# Altium PCB S56_MLD_tiny.pcbdoc (part 1 of 3)
Units mm, origin at the board's own origin, x right, y up, seen from the top; angles counter-clockwise.
Board outline 37.7 x 36.5 mm, 4 copper layers (Top Layer, Layer 1, Layer 3, Bottom Layer), stack 1.748 mm thick; 192 components, 89 nets, 791 pads, 423 vias.
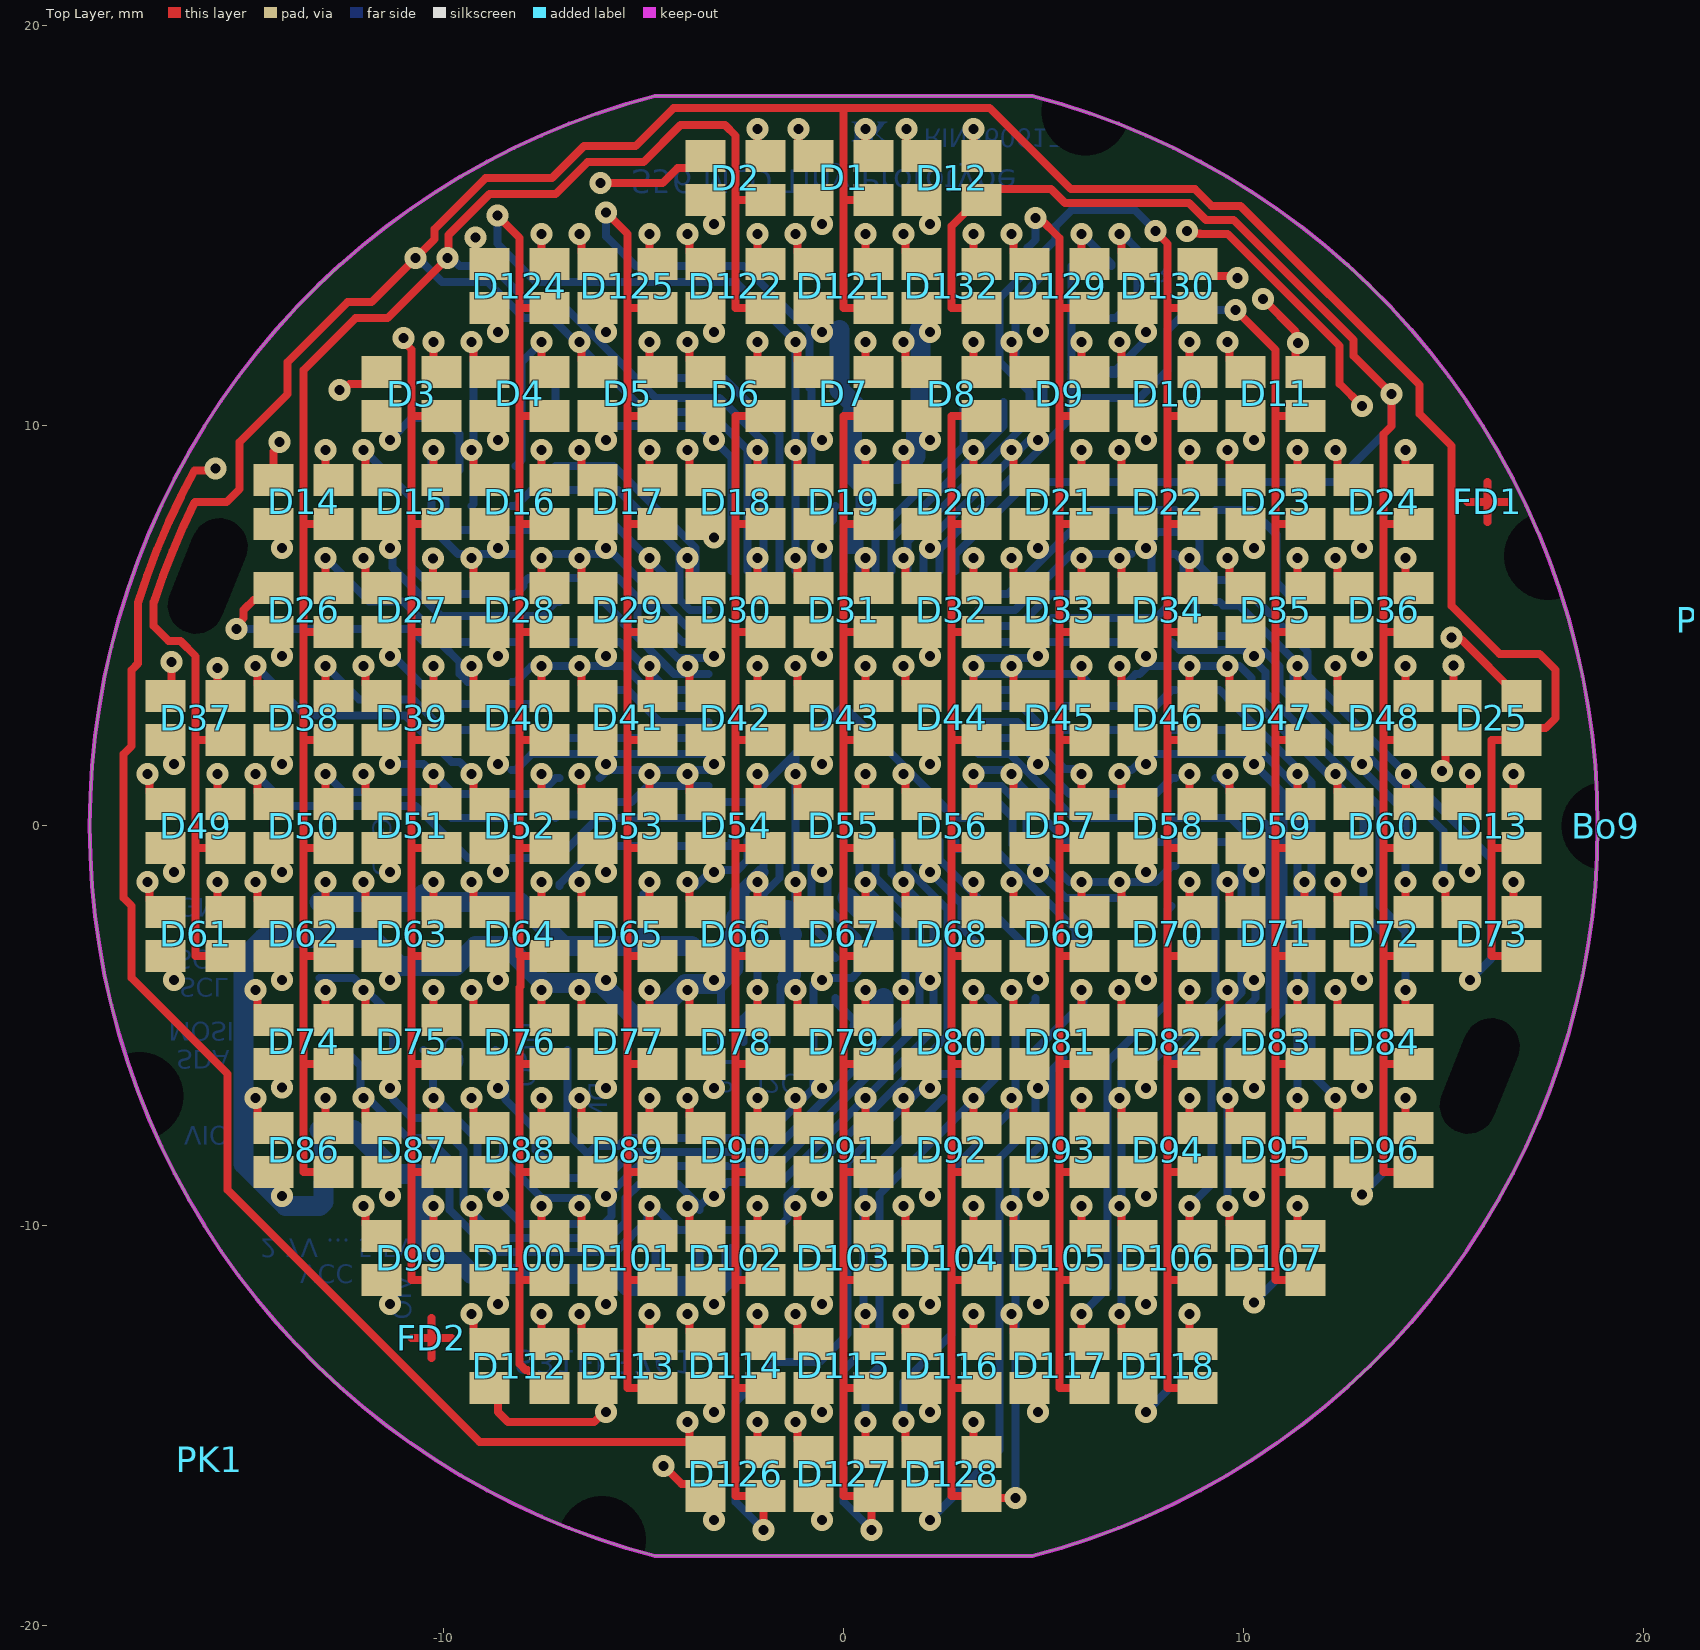
[diagram p0: Top Layer view]
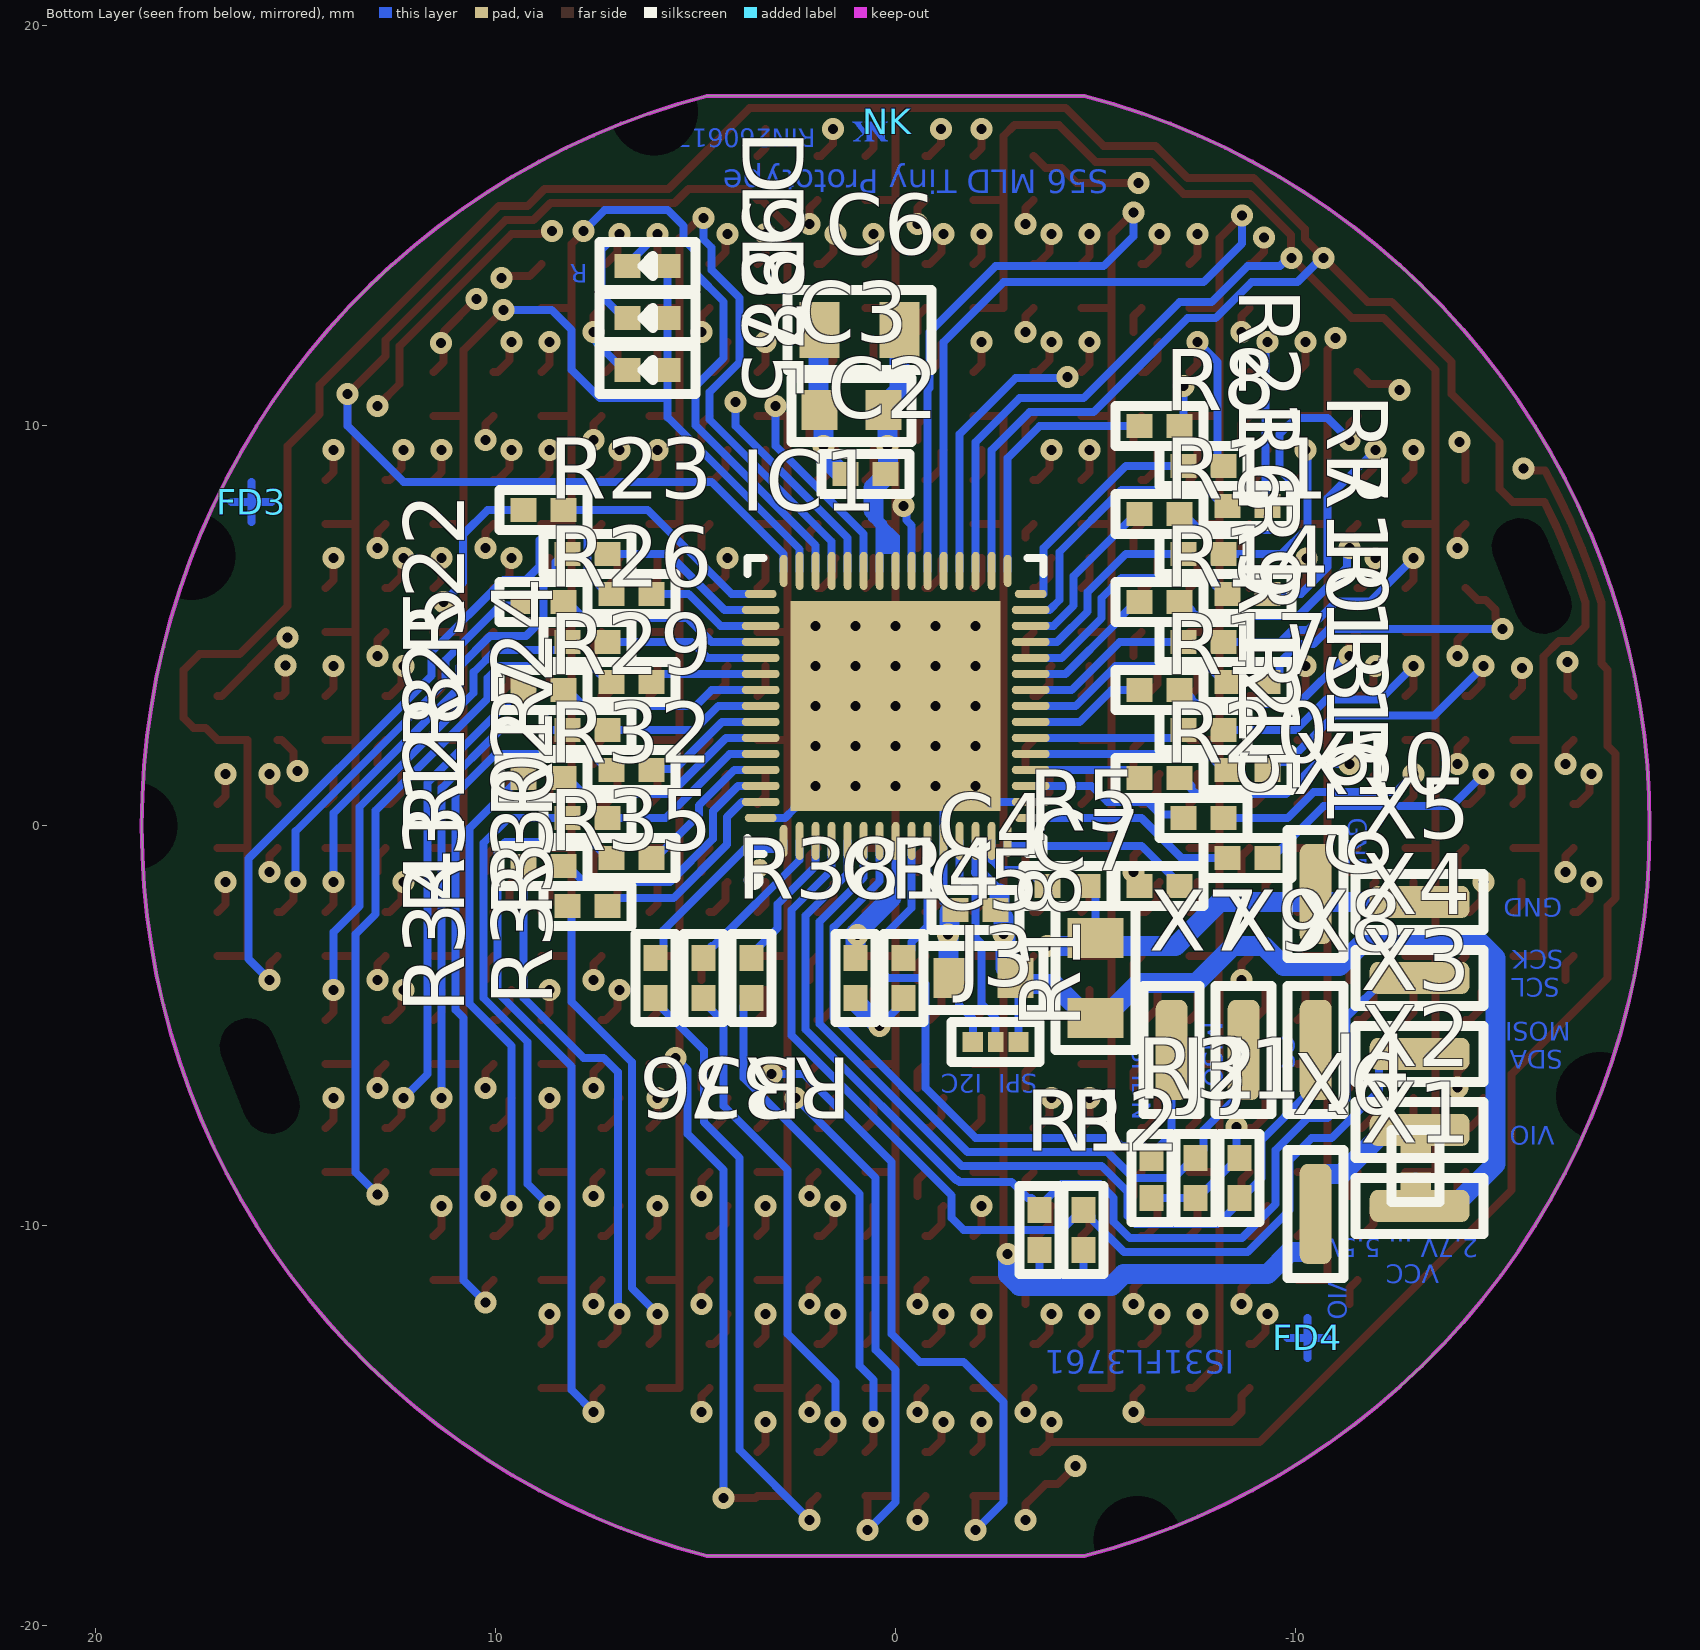
[diagram p1: Bottom Layer view, seen from below]
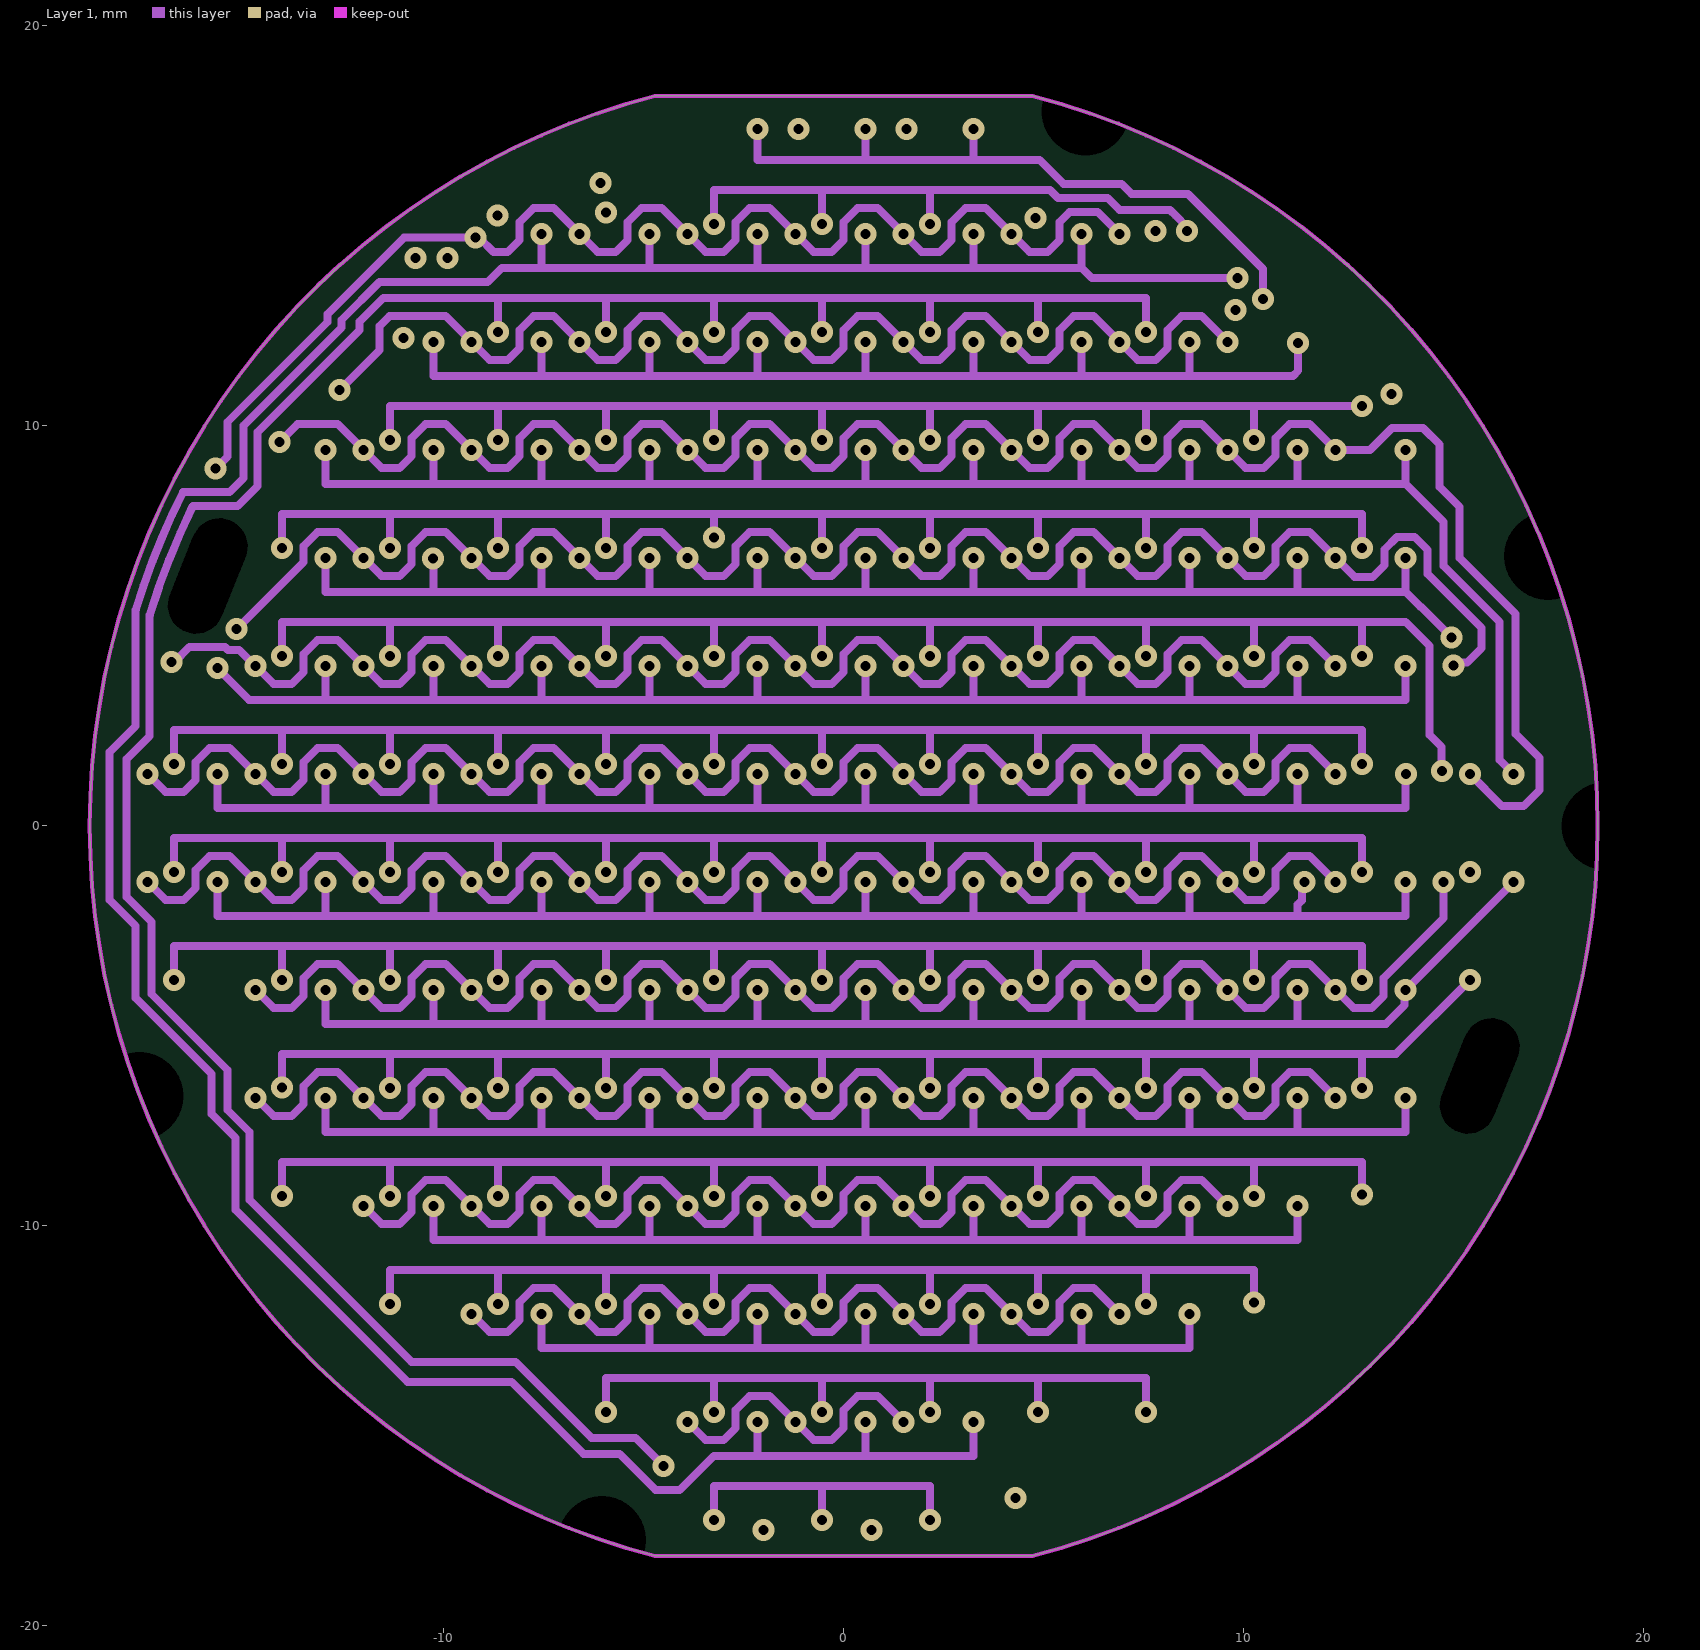
[diagram p2: Layer 1]
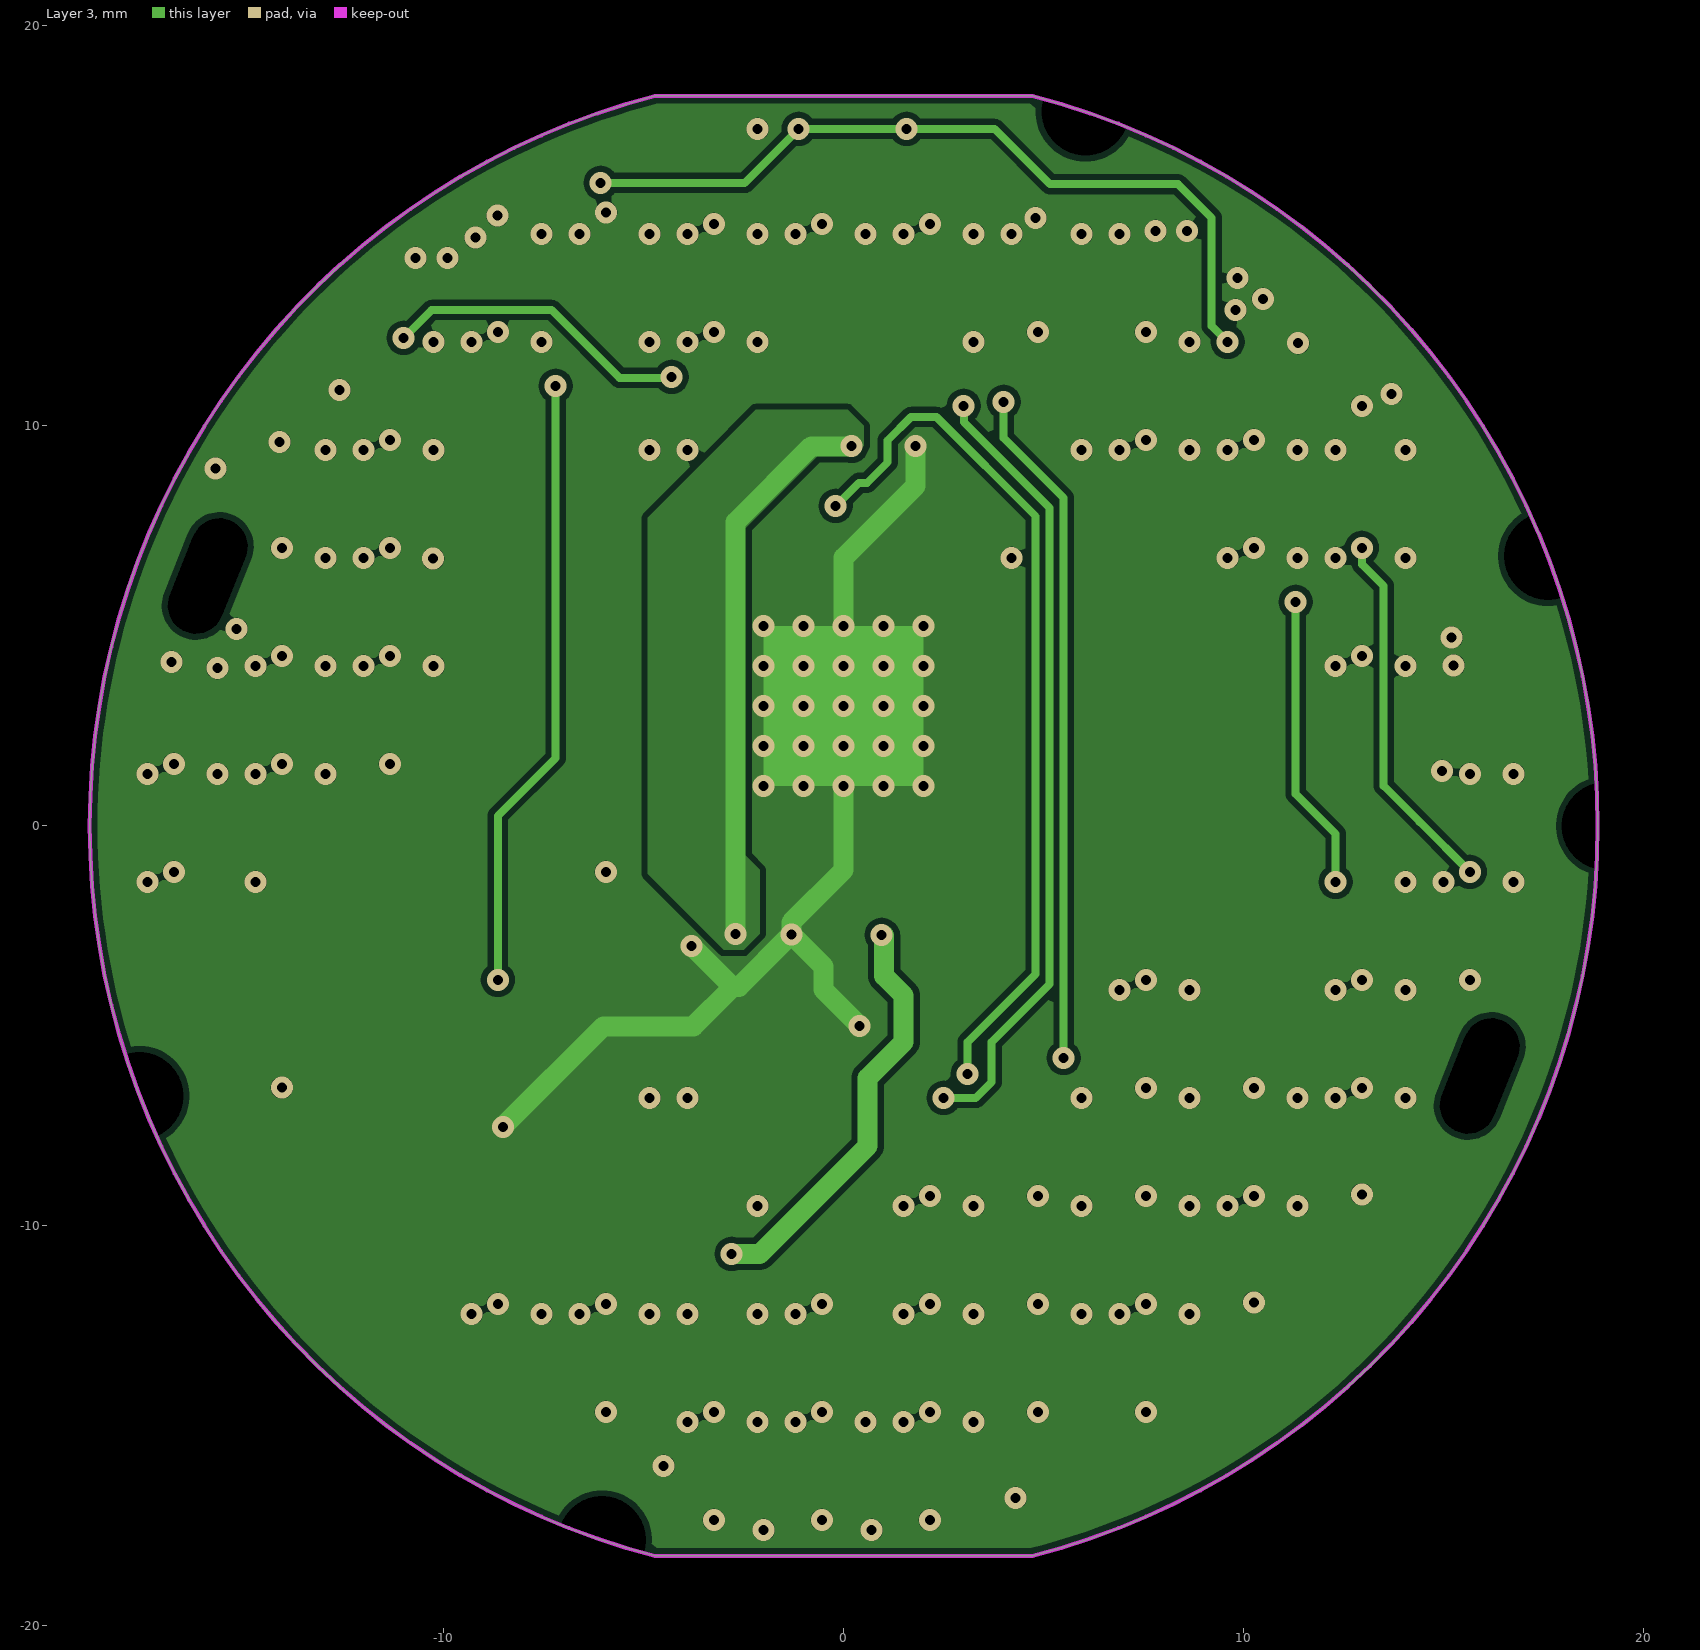
[diagram p3: Layer 3]

## Layer stack, top to bottom
Top Solder: solder mask 0.0102, Solder Resist, Dk 3.5
Top Layer: signal copper 0.035
Dielectric 1: prepreg 0.0711, PP-006, Dk 4.1
Layer 1: signal copper 0.018
Dielectric1: core 1.5, FR-4, Dk 4.8
Layer 3: signal copper 0.018
Dielectric 2: prepreg 0.0711, PP-006, Dk 4.1
Bottom Layer: signal copper 0.035
Bottom Solder: solder mask 0.0102, Solder Resist, Dk 3.5

## Board outline
-4.718,-18.25 4.718,-18.25 ccw(c0,0) 4.718,18.25 -4.718,18.25 ccw(c0,0)

## Design rules (kind name [scope] priority, off if disabled: settings)
Clearance [All] p1: gap=0.15 ignorepadtopadclearanceinfootprint=FALSE
ComponentClearance [All] p1: gap=0.25 collisioncheckmode=3 verticalgap=0.25 showdistances=FALSE
FabricationTestPointUsage TestPointUsage [All] p1: valid=0 allowmultiple=FALSE
FabricationTestpoint Testpoint [All] p1: side=3 testpointundercomponent=TRUE minsize=1.016 maxsize=2.54 preferedsize=1.524 minholesize=0 maxholesize=1.016 preferedholesize=0.813 testpointgrid=0.025 allowsidetop=TRUE allowsidebottom=TRUE usegrid=TRUE gridtolerance=0
HoleSize [All] p1: absolutevalues=TRUE maxlimit=10 minlimit=0.2 maxpercent=80.000 minpercent=20.000
HoleToHoleClearance [All] p1: gap=0.25 allowstackedmicrovias=TRUE
MinimumSolderMaskSliver [All] p1: minsoldermaskwidth=0.2
PlaneConnect [All] p1: planeconnectstyle=Direct reliefexpansion=0.508 reliefentries=4 reliefconductorwidth=0.254 reliefairgap=0.254
PolygonConnect [All] p1: connectstyle=Direct reliefconductorwidth=0.254 reliefentries=4 polygonreliefangle="90 Angle" airgapwidth=0.254
RoutingLayers [All] p1: top layer_v5=TRUE mid layer 1_v5=FALSE mid layer 2_v5=FALSE bottom layer_v5=TRUE
RoutingVias [All] p1: holewidth=0.6 width=1.2 viastyle="Through Hole" minholewidth=0.6 minwidth=1.2 maxholewidth=0.6 maxwidth=1.2
SilkToSilkClearance [All] p1: silktosilkclearance=0.25
SilkToSolderMaskClearance SilkscreenOverComponentPads [IsPad] p1: minsilkscreentomaskgap=0.25 clearancetoexposedcopper=TRUE
SolderMaskExpansion [All] p1: expansion=0.1 istentingtop=FALSE
SupplyNets "Schematic Supply Nets" [InNet('VIO')] p1: voltage=0.000
SupplyNets "Schematic Supply Nets_2" [InNet('AVCC')] p2: voltage=0.000
SupplyNets "Schematic Supply Nets_1" [InNet('GND')] p3: voltage=0.000
Width Fidujel [IsTrack And InComponent('FD*')] p1: maxlimit=0.2 minlimit=0.2 preferedwidth=0.2
Width [All] p2: maxlimit=1 minlimit=0.15 preferedwidth=0.5
20 further rules are at their usual default settings.

## Classes and differential pairs
component class S56_MLD_tiny_Main: NK X1 X2 X3 X4 X5 X6 X7 X8 X9 X10
net class N000-2_[1..33]: C1 C2 C3 C4 C5 C6 C7 C8 C9 C10 C11 C12 C13 C14 C15 C16 C17 C18 C19 C20 C21 C22 C23 C24 C25 C26 C27 C28 C29 C30 C31 C32 C33 N000-2_1 N000-2_2 N000-2_3 N000-2_4 N000-2_5 N000-2_6 N000-2_7 N000-2_8 N000-2_9 N000-2_10 N000-2_11 N000-2_12 N000-2_13 N000-2_14 N000-2_15 N000-2_16 N000-2_17 N000-2_18 N000-2_19 N000-2_20 N000-2_21 N000-2_22 N000-2_23 N000-2_24 N000-2_25 N000-2_26 N000-2_27 N000-2_28 N000-2_29 N000-2_30 N000-2_31 N000-2_32 N000-2_33
net class N000-1_[1..12]: N000-1_1 N000-1_2 N000-1_3 N000-1_4 N000-1_5 N000-1_6 N000-1_7 N000-1_8 N000-1_9 N000-1_10 N000-1_11 N000-1_12 R1 R2 R3 R4 R5 R6 R7 R8 R9 R10 R11 R12
component class Designator: C1 C2 C3 C4 C5 C6 C7 IC1 J1 J2 J3 J4 R1 R2 R3 R4 R5
component class Designator: D1 D2 D3 D4 D5 D6 D7 D8 D9 D10 D11 D12 D13 D14 D15 D16 D17 D18 D19 D20 D21 D22 D23 D24 D25 D26 D27 D28 D29 D30 D31 D32 D33 D34 D35 D36 D37 D38 D39 D40 D41 D42 D43 D44 D45 D46 D47 D48 D49 D50 D51 D52 D53 D54 D55 D56 D57 D58 D59 D60 D61 D62 D63 D64 D65 D66 D67 D68 D69 D70 D71 D72 D73 D74 D75 D76 D77 D78 D79 D80 D81 D82 D83 D84 D85 D86 D87 D88 D89 D90 D91 D92 D93 D94 D95 D96 D97 D98 D99 D100 D101 D102 D103 D104 D105 D106 D107 D108 D109 D110 D111 D112 D113 D114 D115 D116 D117 D118 D120 D121 D122 D123 D124 D125 D126 D127 D128 D129 D130 D132 R6 R7 R8 R9 R10 R11 R12 R13 R14 R15 R16 R17 R18 R19 R20 R21 R22 R23 R24 R25 R26 R27 R28 R29 R30 R31 R32 R33 R34 R35 R36 R37 R38

## Components (designator, comment, footprint, x,y, rotation, side; value= is the part's Value field where it differs from the comment)
Bo9 "Comment" NPTH_D2.2mm 19.05,0 r0 top locked
C1 "100nF" C0402G 1,-3.8 r270 bottom
C2 "100nF" C0402G 0.75,8.8 r180 bottom
C3 "470nF" C0603G 1.1,10.4 r180 bottom
C4 "100nF" C0402G -2,-2.1 r180 bottom
C5 "470nF" C0603G -2.2,-3.8 r180 bottom
C6 "10uF" C0805G 0.9,12.4 r180 bottom
C7 "10uF" C0805G -5,-3.8 r270 bottom
D1 "LED_RGB_BLOCK" PLCC-4_2020 0,16.2 r0 top
D2 "LED_RGB_BLOCK" PLCC-4_2020 -2.7,16.2 r0 top
D3 "LED_RGB_BLOCK" PLCC-4_2020 -10.8,10.8 r0 top
D4 "LED_RGB_BLOCK" PLCC-4_2020 -8.1,10.8 r0 top
D5 "LED_RGB_BLOCK" PLCC-4_2020 -5.4,10.8 r0 top
D6 "LED_RGB_BLOCK" PLCC-4_2020 -2.7,10.8 r0 top
D7 "LED_RGB_BLOCK" PLCC-4_2020 0,10.8 r0 top
D8 "LED_RGB_BLOCK" PLCC-4_2020 2.7,10.8 r0 top
D9 "LED_RGB_BLOCK" PLCC-4_2020 5.4,10.8 r0 top
D10 "LED_RGB_BLOCK" PLCC-4_2020 8.1,10.8 r0 top
D11 "LED_RGB_BLOCK" PLCC-4_2020 10.8,10.8 r0 top
D12 "LED_RGB_BLOCK" PLCC-4_2020 2.7,16.2 r0 top
D13 "LED_RGB_BLOCK" PLCC-4_2020 16.2,0 r0 top
D14 "LED_RGB_BLOCK" PLCC-4_2020 -13.5,8.1 r0 top
D15 "LED_RGB_BLOCK" PLCC-4_2020 -10.8,8.1 r0 top
D16 "LED_RGB_BLOCK" PLCC-4_2020 -8.1,8.1 r0 top
D17 "LED_RGB_BLOCK" PLCC-4_2020 -5.4,8.1 r0 top
D18 "LED_RGB_BLOCK" PLCC-4_2020 -2.7,8.1 r0 top
D19 "LED_RGB_BLOCK" PLCC-4_2020 0,8.1 r0 top
D20 "LED_RGB_BLOCK" PLCC-4_2020 2.7,8.1 r0 top
D21 "LED_RGB_BLOCK" PLCC-4_2020 5.4,8.1 r0 top
D22 "LED_RGB_BLOCK" PLCC-4_2020 8.1,8.1 r0 top
D23 "LED_RGB_BLOCK" PLCC-4_2020 10.8,8.1 r0 top
D24 "LED_RGB_BLOCK" PLCC-4_2020 13.5,8.1 r0 top
D25 "LED_RGB_BLOCK" PLCC-4_2020 16.2,2.7 r0 top
D26 "LED_RGB_BLOCK" PLCC-4_2020 -13.5,5.4 r0 top
D27 "LED_RGB_BLOCK" PLCC-4_2020 -10.8,5.4 r0 top
D28 "LED_RGB_BLOCK" PLCC-4_2020 -8.1,5.4 r0 top
D29 "LED_RGB_BLOCK" PLCC-4_2020 -5.4,5.4 r0 top
D30 "LED_RGB_BLOCK" PLCC-4_2020 -2.7,5.4 r0 top
D31 "LED_RGB_BLOCK" PLCC-4_2020 0,5.4 r0 top
D32 "LED_RGB_BLOCK" PLCC-4_2020 2.7,5.4 r0 top
D33 "LED_RGB_BLOCK" PLCC-4_2020 5.4,5.4 r0 top
D34 "LED_RGB_BLOCK" PLCC-4_2020 8.1,5.4 r0 top
D35 "LED_RGB_BLOCK" PLCC-4_2020 10.8,5.4 r0 top
D36 "LED_RGB_BLOCK" PLCC-4_2020 13.5,5.4 r0 top
D37 "LED_RGB_BLOCK" PLCC-4_2020 -16.2,2.7 r0 top
D38 "LED_RGB_BLOCK" PLCC-4_2020 -13.5,2.7 r0 top
D39 "LED_RGB_BLOCK" PLCC-4_2020 -10.8,2.7 r0 top
D40 "LED_RGB_BLOCK" PLCC-4_2020 -8.1,2.7 r0 top
D41 "LED_RGB_BLOCK" PLCC-4_2020 -5.4,2.7 r0 top
D42 "LED_RGB_BLOCK" PLCC-4_2020 -2.7,2.7 r0 top
D43 "LED_RGB_BLOCK" PLCC-4_2020 0,2.7 r0 top
D44 "LED_RGB_BLOCK" PLCC-4_2020 2.7,2.7 r0 top
D45 "LED_RGB_BLOCK" PLCC-4_2020 5.4,2.7 r0 top
D46 "LED_RGB_BLOCK" PLCC-4_2020 8.1,2.7 r0 top
D47 "LED_RGB_BLOCK" PLCC-4_2020 10.8,2.7 r0 top
D48 "LED_RGB_BLOCK" PLCC-4_2020 13.5,2.7 r0 top
D49 "LED_RGB_BLOCK" PLCC-4_2020 -16.2,0 r0 top
D50 "LED_RGB_BLOCK" PLCC-4_2020 -13.5,0 r0 top
D51 "LED_RGB_BLOCK" PLCC-4_2020 -10.8,0 r0 top
D52 "LED_RGB_BLOCK" PLCC-4_2020 -8.1,0 r0 top
D53 "LED_RGB_BLOCK" PLCC-4_2020 -5.4,0 r0 top
D54 "LED_RGB_BLOCK" PLCC-4_2020 -2.7,0 r0 top
D55 "LED_RGB_BLOCK" PLCC-4_2020 0,0 r0 top
D56 "LED_RGB_BLOCK" PLCC-4_2020 2.7,0 r0 top
D57 "LED_RGB_BLOCK" PLCC-4_2020 5.4,0 r0 top
D58 "LED_RGB_BLOCK" PLCC-4_2020 8.1,0 r0 top
D59 "LED_RGB_BLOCK" PLCC-4_2020 10.8,0 r0 top
D60 "LED_RGB_BLOCK" PLCC-4_2020 13.5,0 r0 top
D61 "LED_RGB_BLOCK" PLCC-4_2020 -16.2,-2.7 r0 top
D62 "LED_RGB_BLOCK" PLCC-4_2020 -13.5,-2.7 r0 top
D63 "LED_RGB_BLOCK" PLCC-4_2020 -10.8,-2.7 r0 top
D64 "LED_RGB_BLOCK" PLCC-4_2020 -8.1,-2.7 r0 top
D65 "LED_RGB_BLOCK" PLCC-4_2020 -5.4,-2.7 r0 top
D66 "LED_RGB_BLOCK" PLCC-4_2020 -2.7,-2.7 r0 top
D67 "LED_RGB_BLOCK" PLCC-4_2020 0,-2.7 r0 top
D68 "LED_RGB_BLOCK" PLCC-4_2020 2.7,-2.7 r0 top
D69 "LED_RGB_BLOCK" PLCC-4_2020 5.4,-2.7 r0 top
D70 "LED_RGB_BLOCK" PLCC-4_2020 8.1,-2.7 r0 top
D71 "LED_RGB_BLOCK" PLCC-4_2020 10.8,-2.7 r0 top
D72 "LED_RGB_BLOCK" PLCC-4_2020 13.5,-2.7 r0 top
D73 "LED_RGB_BLOCK" PLCC-4_2020 16.2,-2.7 r0 top
D74 "LED_RGB_BLOCK" PLCC-4_2020 -13.5,-5.4 r0 top
D75 "LED_RGB_BLOCK" PLCC-4_2020 -10.8,-5.4 r0 top
D76 "LED_RGB_BLOCK" PLCC-4_2020 -8.1,-5.4 r0 top
D77 "LED_RGB_BLOCK" PLCC-4_2020 -5.4,-5.4 r0 top
D78 "LED_RGB_BLOCK" PLCC-4_2020 -2.7,-5.4 r0 top
D79 "LED_RGB_BLOCK" PLCC-4_2020 0,-5.4 r0 top
D80 "LED_RGB_BLOCK" PLCC-4_2020 2.7,-5.4 r0 top
D81 "LED_RGB_BLOCK" PLCC-4_2020 5.4,-5.4 r0 top
D82 "LED_RGB_BLOCK" PLCC-4_2020 8.1,-5.4 r0 top
D83 "LED_RGB_BLOCK" PLCC-4_2020 10.8,-5.4 r0 top
D84 "LED_RGB_BLOCK" PLCC-4_2020 13.5,-5.4 r0 top
D85 "LED_ORANGE" D0402G 6.2,11.4 r0 bottom
D86 "LED_RGB_BLOCK" PLCC-4_2020 -13.5,-8.1 r0 top
D87 "LED_RGB_BLOCK" PLCC-4_2020 -10.8,-8.1 r0 top
D88 "LED_RGB_BLOCK" PLCC-4_2020 -8.1,-8.1 r0 top
D89 "LED_RGB_BLOCK" PLCC-4_2020 -5.4,-8.1 r0 top
D90 "LED_RGB_BLOCK" PLCC-4_2020 -2.7,-8.1 r0 top
D91 "LED_RGB_BLOCK" PLCC-4_2020 0,-8.1 r0 top
D92 "LED_RGB_BLOCK" PLCC-4_2020 2.7,-8.1 r0 top
D93 "LED_RGB_BLOCK" PLCC-4_2020 5.4,-8.1 r0 top
D94 "LED_RGB_BLOCK" PLCC-4_2020 8.1,-8.1 r0 top
D95 "LED_RGB_BLOCK" PLCC-4_2020 10.8,-8.1 r0 top
D96 "LED_RGB_BLOCK" PLCC-4_2020 13.5,-8.1 r0 top
D97 "LED_GREEN" D0402G 6.2,12.7 r0 bottom
D98 "LED_RED" D0402G 6.2,14 r0 bottom
D99 "LED_RGB_BLOCK" PLCC-4_2020 -10.8,-10.8 r0 top
D100 "LED_RGB_BLOCK" PLCC-4_2020 -8.1,-10.8 r0 top
D101 "LED_RGB_BLOCK" PLCC-4_2020 -5.4,-10.8 r0 top
D102 "LED_RGB_BLOCK" PLCC-4_2020 -2.7,-10.8 r0 top
D103 "LED_RGB_BLOCK" PLCC-4_2020 0,-10.8 r0 top
D104 "LED_RGB_BLOCK" PLCC-4_2020 2.7,-10.8 r0 top
D105 "LED_RGB_BLOCK" PLCC-4_2020 5.4,-10.8 r0 top
D106 "LED_RGB_BLOCK" PLCC-4_2020 8.1,-10.8 r0 top
D107 "LED_RGB_BLOCK" PLCC-4_2020 10.8,-10.8 r0 top
D112 "LED_RGB_BLOCK" PLCC-4_2020 -8.1,-13.5 r0 top
D113 "LED_RGB_BLOCK" PLCC-4_2020 -5.4,-13.5 r0 top
D114 "LED_RGB_BLOCK" PLCC-4_2020 -2.7,-13.5 r0 top
D115 "LED_RGB_BLOCK" PLCC-4_2020 0,-13.5 r0 top
D116 "LED_RGB_BLOCK" PLCC-4_2020 2.7,-13.5 r0 top
D117 "LED_RGB_BLOCK" PLCC-4_2020 5.4,-13.5 r0 top
D118 "LED_RGB_BLOCK" PLCC-4_2020 8.1,-13.5 r0 top
D121 "LED_RGB_BLOCK" PLCC-4_2020 0,13.5 r0 top
D122 "LED_RGB_BLOCK" PLCC-4_2020 -2.7,13.5 r0 top
D124 "LED_RGB_BLOCK" PLCC-4_2020 -8.1,13.5 r0 top
D125 "LED_RGB_BLOCK" PLCC-4_2020 -5.4,13.5 r0 top
D126 "LED_RGB_BLOCK" PLCC-4_2020 -2.7,-16.2 r0 top
D127 "LED_RGB_BLOCK" PLCC-4_2020 0,-16.2 r0 top
D128 "LED_RGB_BLOCK" PLCC-4_2020 2.7,-16.2 r0 top
D129 "LED_RGB_BLOCK" PLCC-4_2020 5.4,13.5 r0 top
D130 "LED_RGB_BLOCK" PLCC-4_2020 8.1,13.5 r0 top
D132 "LED_RGB_BLOCK" PLCC-4_2020 2.7,13.5 r0 top
FD1 "Comment" FIDTOP 16.1,8.1 r0 top
FD2 "Comment" FIDTOP -10.3,-12.8 r0 top
FD3 "Comment" FIDTOP 16.1,8.1 r180 bottom
FD4 "Comment" FIDTOP -10.3,-12.8 r180 bottom
IC1 "IS31FL3761-QFLS4-TR" QFN40P700X700X80_HS-61N 0,3 r90 bottom
J1 "ADDR1/CS" R0402G -8.6,-8.8 r270 bottom
J2 "ADDR2/MISO" R0402G -7.5,-8.8 r90 bottom
J3 "SEL" JUMP_2W_0402 -2.5,-5.4 r180 bottom
J4 "VIO := PVCC" JUMP_1W_0603_SOLDER -13,-8.5 r90 bottom
NK "" LOGO_NK_0MM5 0.2,17.6 r0 bottom
PK1 "Comment" PASSKREUZ -15.85,-15.85 r0 top locked
PK2 "Comment" PASSKREUZ 21.65,5.15 r0 top locked
R1 "4k7" R0402G -3.6,-10.1 r270 bottom
R2 "4k7" R0402G -4.7,-10.1 r270 bottom
R3 "100k" R0402G -6.4,-8.8 r90 bottom
R4 "10k" R0402G -0.2,-3.8 r90 bottom
R5 "27k" R0402G -4.3,-1.5 r0 bottom
R6 "9E1" R0402G -6.6,7.8 r0 bottom
R7 "9E1" R0402G -8.8,8 r0 bottom
R8 "47E" R0402G -7.7,9 r0 bottom
R9 "9E1" R0402G -6.6,5.6 r0 bottom
R10 "9E1" R0402G -8.8,5.8 r0 bottom
R11 "47E" R0402G -7.7,6.8 r0 bottom
R12 "9E1" R0402G -6.6,3.4 r0 bottom
R13 "9E1" R0402G -8.8,3.6 r0 bottom
R14 "47E" R0402G -7.7,4.6 r0 bottom
R15 "9E1" R0402G -6.6,1.2 r0 bottom
R16 "9E1" R0402G -8.8,1.4 r0 bottom
R17 "47E" R0402G -7.7,2.4 r0 bottom
R18 "9E1" R0402G -6.6,-1.5 r180 bottom
R19 "9E1" R0402G -8.8,-0.8 r0 bottom
R20 "47E" R0402G -7.7,0.2 r0 bottom
R21 "9E1" R0402G -6.6,10 r0 bottom
R22 "9E1" R0402G 8.8,7.9 r180 bottom
R23 "47E" R0402G 7.7,6.8 r180 bottom
R24 "9E1" R0402G 6.6,5.8 r180 bottom
R25 "9E1" R0402G 8.8,5.6 r180 bottom
R26 "47E" R0402G 7.7,4.6 r180 bottom
R27 "9E1" R0402G 6.6,3.6 r180 bottom
R28 "9E1" R0402G 8.8,3.4 r180 bottom
R29 "47E" R0402G 7.7,2.4 r180 bottom
R30 "9E1" R0402G 6.6,1.4 r180 bottom
R31 "9E1" R0402G 8.8,1.2 r180 bottom
R32 "47E" R0402G 7.7,0.2 r180 bottom
R33 "9E1" R0402G 6.6,-0.8 r180 bottom
R34 "9E1" R0402G 8.8,-1 r180 bottom
R35 "47E" R0402G 7.7,-2 r180 bottom
R36 "9E1" R0402G 6,-3.8 r90 bottom
R37 "9E1" R0402G 4.8,-3.8 r90 bottom
R38 "47E" R0402G 3.6,-3.8 r90 bottom
X1 "TEST_PIN" TEST_PAD_S -13.1,-9.5 r0 bottom
X2 "TEST_PIN" TEST_PAD_S -13.1,-7.6 r0 bottom
X3 "TEST_PIN" TEST_PAD_S -13.1,-5.7 r0 bottom
X4 "TEST_PIN" TEST_PAD_S -13.1,-3.8 r0 bottom
X5 "TEST_PIN" TEST_PAD_S -13.1,-1.9 r0 bottom
X6 "TEST_PIN" TEST_PAD_S -10.5,-9.7 r90 bottom
X7 "TEST_PIN" TEST_PAD_S -6.9,-5.6 r90 bottom
X8 "TEST_PIN" TEST_PAD_S -10.5,-5.6 r90 bottom
X9 "TEST_PIN" TEST_PAD_S -8.7,-5.6 r90 bottom
X10 "TEST_PIN" TEST_PAD_S -10.5,-1.7 r90 bottom

## Footprints (in the part's own frame and the unit in brackets; to place one, negate y for a bottom-side part, rotate by r counter-clockwise, add the part's x,y. Pads: shape width x height; smd on the part's side, far side on the other; paste and mask are expansions set on the pad)
C0402G [mm] "(true 0.1mm Grid)"
  rect 0.65x0.6 smd: 1(-0.5,0) 2(0.5,0)
  silkscreen extent -1.1,-0.5 1.1,0.5, body extent -0.5,-0.25 0.5,0.25, height 0.5
C0603G [mm] "(true 0.1mm Grid)"
  rect 0.9x1 smd: 1(-0.8,0) 2(0.8,0)
  silkscreen extent -1.5,-0.8 1.5,0.8, body extent -0.8,-0.4 0.8,0.4, height 0.8
C0805G [mm] "(true 0.1mm Grid)"
  rect 1x1.4 smd: 1(-1,0) 2(1,0)
  silkscreen extent -1.8,-1 1.8,1, body extent -1,-0.63 1,0.63, height 1
D0402G [mm] "(true 0.1mm Grid)"
  rect 0.65x0.6 smd: A(-0.5,0) K(0.5,0)
  silkscreen extent -1.2,-0.6 1.2,0.6
FIDTOP [mm]
  Top Layer lines w0.2: -0.5,0 0.5,0 ; 0,-0.5 0,0.5
JUMP_1W_0603_SOLDER [mil]
  rect 20x30 smd paste-39.37: 1(-16.25,0) 2(16.25,0)
  silkscreen extent -35,-24 35,24, body extent -16,-16 16,16, height 16
JUMP_2W_0402 [mil]
  rect 20x20 smd paste-39.37: 1(-22.5,0) 3(22.5,0)
  rect 15x20 smd paste-39.37: 2(0,0)
  silkscreen extent -43,-20 43,20
LOGO_NK_0MM5 [mm] "Times New Roman, bold, height 0.8mm"
  Top Layer region: 0,0.012 0.008,0.012 0.025,0.015 0.035,0.018 0.042,0.02 0.048,0.022 0.058,0.03 0.062,0.04 0.068,0.058 0.07,0.075 0.07,0.42 0.058,0.435 0.04,0.453 0.028,0.46 0.018,0.463 -0.002,0.465 -0.002,0.477 0.168,0.477 0.405,0.178 0.405,0.393 0.403,0.417 0.397,0.435 0.39,0.447 0.38,0.455 0.363,0.463 0.345,0.465 0.335,0.465 0.335,0.477 0.575,0.477 0.575,0.465 0.567,0.465 0.553,0.463 0.543,0.46 0.535,0.455 0.525,0.445 0.523,0.437 0.52,0.42 0.52,0.248 0.7,0.393 0.715,0.407 0.727,0.423 0.733,0.433 0.733,0.443 0.73,0.45 0.723,0.457 0.71,0.463 0.69,0.465 0.68,0.465 0.68,0.477 0.865,0.477 0.865,0.465 0.86,0.465 0.845,0.463 0.83,0.457 0.813,0.447 0.793,0.433 0.623,0.295 0.795,0.075 0.817,0.05 0.837,0.032 0.853,0.022 0.865,0.018 0.883,0.012 0.89,0.012 0.89,0 0.643,0 0.643,0.012 0.645,0.012 0.66,0.015 0.667,0.018 0.675,0.022 0.677,0.03 0.677,0.038 0.673,0.05 0.665,0.062 0.655,0.078 0.635,0.102 0.537,0.225 0.52,0.21 0.52,0.058 0.523,0.035 0.533,0.022 0.543,0.018 0.553,0.015 0.567,0.012 0.577,0.012 0.577,0 0.407,0 0.098,0.385 0.098,0.075 0.1,0.055 0.105,0.04 0.112,0.03 0.122,0.022 0.132,0.018 0.142,0.015 0.16,0.012 0.17,0.012 0.17,0 0,0
NPTH_D2.2mm [mm] "Bohrung 2,2mm nicht metalisiert"
  round 0 hole 2.2 unplated: 1(0,0)
PASSKREUZ [mm]
PLCC-4_2020 [mm]
  rect 1x0.8 smd: 1(0.75,-0.55) 2(-0.75,-0.55) 3(-0.75,0.55) 4(0.75,0.55)
  body extent -1,-1 1,1, height 0.9
QFN40P700X700X80_HS-61N [mm] "QFN, 60-Leads, Body 7.00x7.00mm, Pitch 0.40mm, Thermal Pad 5.25x5.25mm, IPC Medium Density"
  oval 0.8x0.2 smd: 1(-3.375,2.8) 15(-3.375,-2.8) 31(3.375,-2.8) 45(3.375,2.8)
  oval 0.95x0.2 smd: 2(-3.375,2.4) 3(-3.375,2) 4(-3.375,1.6) 5(-3.375,1.2) 6(-3.375,0.8) 7(-3.375,0.4) 8(-3.375,0) 9(-3.375,-0.4) 10(-3.375,-0.8) 11(-3.375,-1.2) 12(-3.375,-1.6) 13(-3.375,-2) 14(-3.375,-2.4) 32(3.375,-2.4) 33(3.375,-2) 34(3.375,-1.6) 35(3.375,-1.2) 36(3.375,-0.8) 37(3.375,-0.4) 38(3.375,0) 39(3.375,0.4) 40(3.375,0.8) 41(3.375,1.2) 42(3.375,1.6) 43(3.375,2) 44(3.375,2.4)
  oval 0.2x0.8 smd: 16(-2.8,-3.375) 30(2.8,-3.375) 46(2.8,3.375) 60(-2.8,3.375)
  oval 0.2x0.95 smd: 17(-2.4,-3.375) 18(-2,-3.375) 19(-1.6,-3.375) 20(-1.2,-3.375) 21(-0.8,-3.375) 22(-0.4,-3.375) 23(0,-3.375) 24(0.4,-3.375) 25(0.8,-3.375) 26(1.2,-3.375) 27(1.6,-3.375) 28(2,-3.375) 29(2.4,-3.375) 47(2.4,3.375) 48(2,3.375) 49(1.6,3.375) 50(1.2,3.375) 51(0.8,3.375) 52(0.4,3.375) 53(0,3.375) 54(-0.4,3.375) 55(-0.8,3.375) 56(-1.2,3.375) 57(-1.6,3.375) 58(-2,3.375) 59(-2.4,3.375)
  rect 5.25x5.25 smd paste-20: 61(0,0)
  round 0.45 smd paste-10 mask+0: ""(-4.05,3.4)
  silkscreen extent -4.47,-3.7 3.7,3.7, body extent -3.55,-3.55 3.55,3.55, height 0.8
R0402G [mm] "(true 0.1mm Grid)"
  rect 0.65x0.6 smd: 1(-0.5,0) 2(0.5,0)
  silkscreen extent -1.1,-0.5 1.1,0.5, body extent -0.5,-0.25 0.5,0.25, height 0.35
TEST_PAD_S [mm]
  rrect50% 2.5x0.8 smd paste-10: 1(0,0)
  silkscreen extent -1.6,-0.7 1.6,0.7

## Part data
C1 C2 C4: library part CAP10, "Capacitor, unipolar"
C3 C5: library part CAP20L, "Capacitor, unipolar", Manufacturer="KYOCERA AVX", Digikey=478-KAM15BR71E474KTCT-ND, Part=KAM15BR71E474KT
C6 C7: library part CAP20L, "Capacitor, unipolar", Manufacturer="Samsung Electro-Mechanics", Digikey=1276-1096-1-ND, Part=CL21A106KOQNNNE
D1 D2 D3 D4 D5 D6 D7 D8 D9 D10 D11 D12 D13 D14 D15 D16 D17 D18 D19 D20 D21 D22 D23 D24 D25 D26 D27 D28 D29 D30 D31 D32 D33 D34 D35 D36 D37 D38 D39 D40 D41 D42 D43 D44 D45 D46 D47 D48 D49 D50 D51 D52 D53 D54 D55 D56 D57 D58 D59 D60 D61 D62 D63 D64 D65 D66 D67 D68 D69 D70 D71 D72 D73 D74 D75 D76 D77 D78 D79 D80 D81 D82 D83 D84 D86 D87 D88 D89 D90 D91 D92 D93 D94 D95 D96 D99 D100 D101 D102 D103 D104 D105 D106 D107 D112 D113 D114 D115 D116 D117 D118 D121 D122 D124 D125 D126 D127 D128 D129 D130 D132: Manufacturer="Cree LED", Digikey=CLMVC-FKA-CL1D1L71BB7C3C3CT-ND, Part=CLMVC-FKA-CL1D1L71BB7C3C3
D85 D97 D98: "LED"
IC1: library part IS31FL3761, "IS31FL3761 in QFN-60", Manufacturer="Lumissil Microsystems", Digikey=2521-IS31FL3761-QFLS4-TRCT-ND, Part=IS31FL3761-QFLS4-TR
J1 J2 J4: library part JUMP_1WAY_SMD_HAT_SET
J3: library part JUMP_2WAY_SMD_HAT_SET1
NK: library part GENERIC_SYMBOL
R1 R2 R3 R4 R5: library part RES10_, "Resistor"
R6 R7 R8 R9 R10 R11 R12 R13 R14 R15 R16 R17 R18 R19 R20 R21 R22 R23 R24 R25 R26 R27 R28 R29 R30 R31 R32 R33 R34 R35 R36 R37 R38: library part RES10_, "Resistor", Manufacturer=YAGEO
  R6 R7 R9 R10 R12 R13 R15 R16 R18 R19 R21 R22 R24 R25 R27 R28 R30 R31 R33 R34 R36 R37: Digikey=13-RC0402FR-079R1LCT-ND, Part=RC0402FR-079R1L
  R8 R11 R14 R17 R20 R23 R26 R29 R32 R35 R38: Digikey=311-47.0LRCT-ND, Part=RC0402FR-0747RL

## Free pads (board coordinates)
  round 0.5 on Mech16: 7(-2.7,16.204) 7(0,16.204) 7(2.7,16.204) 8(-8.1,13.504) 8(-5.4,13.504) 8(-2.7,13.504) 8(0,13.504) 8(2.7,13.504) 8(5.4,13.504) 8(8.1,13.504) 9(-10.8,10.804) 9(-8.1,10.804) 9(-5.4,10.804) 9(-2.7,10.804) 9(0,10.804) 9(2.7,10.804) 9(5.4,10.804) 9(8.1,10.804) 9(10.8,10.804) 10(-13.5,8.104) 10(-10.8,8.104) 10(-8.1,8.104) 10(-5.4,8.104) 10(-2.7,8.104) 10(0,8.104) 10(2.7,8.104) 10(5.4,8.104) 10(8.1,8.104) 10(10.8,8.104) 10(13.5,8.104) 11(-13.5,5.404) 11(-10.8,5.404) 11(-8.1,5.404) 11(-5.4,5.404) 11(-2.7,5.404) 11(0,5.404) 11(2.7,5.404) 11(5.4,5.404) 11(8.1,5.404) 11(10.8,5.404) 11(13.5,5.404) 12(-16.2,2.704) 12(-13.5,2.704) 12(-10.8,2.704) 12(-8.1,2.704) 12(-5.4,2.704) 12(-2.7,2.704) 12(0,2.704) 12(2.7,2.704) 12(5.4,2.704) 12(8.1,2.704) 12(10.8,2.704) 12(13.5,2.704) 12(16.2,2.704) 13(-16.2,0.004) 13(-13.5,0.004) 13(-10.8,0.004) 13(-8.1,0.004) 13(-5.4,0.004) 13(-2.7,0.004) 13(0,0.004) 13(2.7,0.004) 13(5.4,0.004) 13(8.1,0.004) 13(10.8,0.004) 13(13.5,0.004) 13(16.2,0.004) 14(-16.2,-2.696) 14(-13.5,-2.696) 14(-10.8,-2.696) 14(-8.1,-2.696) 14(-5.4,-2.696) 14(-2.7,-2.696) 14(0,-2.696) 14(2.7,-2.696) 14(5.4,-2.696) 14(8.1,-2.696) 14(10.8,-2.696) 14(13.5,-2.696) 14(16.2,-2.696) 15(-13.5,-5.396) 15(-10.8,-5.396) 15(-8.1,-5.396) 15(-5.4,-5.396) 15(-2.7,-5.396) 15(0,-5.396) 15(2.7,-5.396) 15(5.4,-5.396) 15(8.1,-5.396) 15(10.8,-5.396) 15(13.5,-5.396) 16(-13.5,-8.096) 16(-10.8,-8.096) 16(-8.1,-8.096) 16(-5.4,-8.096) 16(-2.7,-8.096) 16(0,-8.096) 16(2.7,-8.096) 16(5.4,-8.096) 16(8.1,-8.096) 16(10.8,-8.096) 16(13.5,-8.096) 17(-10.8,-10.796) 17(-8.1,-10.796) 17(-5.4,-10.796) 17(-2.7,-10.796) 17(0,-10.796) 17(2.7,-10.796) 17(5.4,-10.796) 17(8.1,-10.796) 17(10.8,-10.796) 18(-8.1,-13.496) 18(-5.4,-13.496) 18(-2.7,-13.496) 18(0,-13.496) 18(2.7,-13.496) 18(5.4,-13.496) 18(8.1,-13.496) 19(-2.7,-16.196) 19(0,-16.196) 19(2.7,-16.196)
  round 0 hole 2.2 unplated: 21(-17.601,-6.747) 21(17.601,6.747) 23(-6.04,-17.856) 23(6.04,17.856)
  round 0 hole 1.4 slot 3 at 68.39 deg unplated: 22(-15.9,6.25)
  round 0 hole 1.4 slot 3 at 68.38 deg unplated: 22(15.9,-6.25)
  round 2.2 on Mech16: ""(-10.605,10.605) ""(10.605,-10.605)

## Via types
v1: diameter 0.55, hole 0.25, Top Layer to Layer 1, tented both sides, 200 vias
v2: diameter 0.55, hole 0.25, Top Layer to Bottom Layer, tented both sides, 178 vias
v3: diameter 0.55, hole 0.25, Layer 3 to Bottom Layer, tented both sides, 44 vias
v4: diameter 0.55/0.55/0.55/0.55 (per signal layer), hole 0.25, Top Layer to Bottom Layer, tented both sides, 1 vias

## Nets (pads, with @x,y where several pads share a name; then routed paths per layer and width w, separated by ;. In a path a pad name is that pad's centre, name@x,y a point inside that pad or via, vN(x,y) a via of type N, cw(c..) or ccw(c..) an arc to the next point about the centre after c; other vN are vias at no path point)
ADDR1: IC1.6 J1.2 X8.1 | length 22.8
  Bottom Layer w0.2: X8.1@-10.5,-5.6 -10.271,-5.829 -10.271,-6.729 -9.15,-7.85 -9.15,-8.8 -8.65,-9.3 J1.2@-8.6,-9.3 -8.6,-9.4 -8.05,-9.95 -5.996,-9.95 -5.8,-9.754 -5.8,-9.151 -5.149,-8.5 -1.651,-8.5 1.9,-4.949 1.9,-2.387 0.8,-1.287 IC1.6@0.8,-0.375
ADDR2: IC1.7 J2.2 X9.1 | length 19
  Bottom Layer w0.2: X9.1@-8.7,-5.6 -8.462,-5.838 -8.462,-6.838 -7.7,-7.6 -7.7,-8.1 J2.2@-7.5,-8.3 ; J2.2@-7.45,-8.3 -6.95,-8.8 -5.943,-8.8 -5.293,-8.15 -1.796,-8.15 1.55,-4.804 1.55,-2.532 0.4,-1.382 IC1.7@0.4,-0.375
AVCC: C2.2 C3.2 C4.2 C5.2 C6.2 C7.2 IC1.13 IC1.38 IC1.39 J3.3 J4.1 X1.1 | length 48.6
  Layer 3 w0.5: v3(-2.7,-2.7) -2.7,7.6 -0.81,9.49 0.19,9.49 v3(0.2,9.5)
  Bottom Layer w0.2: J3.3@-3.072,-5.4 C5.2@-3.072,-4.05 ; -2.1,-1.2 -2,-1.1 IC1.13@-2,-0.375 ; IC1.38@0,6.375 0,6.87 0.355,7.225 0.4,7.225 IC1.39@0.4,6.375
  Bottom Layer w0.3: 0.355,7.225 0.355,7.535 0.55,7.73 0.55,7.9
  Bottom Layer w0.35: -2.6,-1.694 -2.054,-1.148 -2.052,-1.148
  Bottom Layer w0.5: J4.1@-13,-8.913 -13,-9.4 X1.1@-13.1,-9.5 -13.95,-9.5 -15,-8.45 -15,-3.3 -14.5,-2.8 -11.8,-2.8 -11.1,-3.5 -9.7,-3.5 -9.2,-3 -8.434,-3 -7.509,-3.925 -6.075,-3.925 -5.2,-4.8 C7.2@-5,-4.8 -4.8,-4.8 -3.95,-3.95 -3.15,-3.95 C5.2@-3,-3.8 ; C5.2@-2.852,-3.652 -2.75,-3.55 -2.75,-2.764 -2.7,-2.714 v3(-2.7,-2.7) -2.69,-2.69 -2.69,-2.29 C4.2@-2.5,-2.1 -2.55,-2.1 -2.6,-2.05 -2.6,-1.694 ; C6.2@-0.1,12.4 -0.1,10.9 0.3,10.5 C3.2@0.3,10.4 0.21,10.31 0.21,9.51 v3(0.2,9.5) 0.19,9.49 0.19,8.85 0.24,8.8 C2.2@0.25,8.8 0.25,8.75 0.55,8.45 0.55,7.9
C1: IC1.15 R18.2 | length 4.9
  Bottom Layer w0.2: R18.2@-7.1,-1.5 -7.1,-1.45 -6.15,-0.5 -2.8,-0.5 IC1.15@-2.8,-0.375
C2: IC1.16 R19.2 | length 5.3
  Bottom Layer w0.2: R19.2@-8.3,-0.8 -8.2,-0.8 -7.146,-0.8 -6.146,0.2 IC1.16@-3.375,0.2
C3: IC1.18 R20.2 | length 4.2
  Bottom Layer w0.2: R20.2@-7.2,0.2 -7.117,0.283 -6.617,0.283 -6.3,0.6 -5.3,0.6 -4.9,1 IC1.18@-3.375,1
C4: IC1.19 R15.2 | length 2.8
  Bottom Layer w0.2: R15.2@-6.1,1.2 -5.9,1.4 -4.775,1.4 IC1.19@-3.375,1.4
C5: IC1.20 R16.2 | length 5.1
  Bottom Layer w0.2: R16.2@-8.3,1.4 -8.2,1.4 -7.8,1.8 IC1.20@-3.375,1.8
C6: IC1.21 R17.2 | length 3.9
  Bottom Layer w0.2: R17.2@-7.2,2.4 -7,2.2 IC1.21@-3.375,2.2
C7: IC1.22 R12.2 | length 3.1
  Bottom Layer w0.2: R12.2@-6.1,3.4 -5.4,3.4 -4.6,2.6 IC1.22@-3.375,2.6
C8: IC1.23 R13.2 | length 5.5
  Bottom Layer w0.2: R13.2@-8.3,3.6 -8.2,3.6 -7.8,4 -5.5,4 -4.5,3 IC1.23@-3.375,3
C9: IC1.24 R14.2 | length 4.3
  Bottom Layer w0.2: R14.2@-7.2,4.6 -5.6,4.6 -4.4,3.4 IC1.24@-3.375,3.4
C10: IC1.25 R9.2 | length 3.5
  Bottom Layer w0.2: R9.2@-6.1,5.6 -6,5.6 -5.5,5.1 -5.5,5.055 -4.245,3.8 IC1.25@-3.375,3.8
C11: IC1.26 R10.2 | length 6.3
  Bottom Layer w0.2: R10.2@-8.3,5.8 -8.2,5.8 -8,6 -8,6.083 -7.883,6.2 -5.646,6.2 -5.15,5.704 -5.15,5.2 -4.15,4.2 IC1.26@-3.375,4.2
C12: IC1.27 R11.2 | length 5
  Bottom Layer w0.2: R11.2@-7.2,6.8 -5.751,6.8 -4.8,5.849 -4.8,5.365 -4.035,4.6 IC1.27@-3.375,4.6
C13: IC1.28 R6.2 | length 4.3
  Bottom Layer w0.2: R6.2@-6.1,7.8 -6,7.8 -4.45,6.25 -4.45,5.51 -3.94,5 IC1.28@-3.375,5
C14: IC1.29 R7.2 | length 7
  Bottom Layer w0.2: R7.2@-8.3,8 -8.2,8 -7.8,8.4 -5.646,8.4 -4.1,6.854 -4.1,5.655 -3.845,5.4 IC1.29@-3.375,5.4
C15: IC1.30 R8.2 | length 5.8
  Bottom Layer w0.2: R8.2@-7.2,9 -5.751,9 -3.7,6.949 -3.7,5.8 IC1.30@-3.375,5.8
C16: IC1.31 R21.2 | length 6.5
  Bottom Layer w0.2: R21.2@-6.1,10 -6,10 -3.6,10 -2.8,9.2 IC1.31@-2.8,6.375
C17: IC1.46 R22.2 | length 5.8
  Bottom Layer w0.2: IC1.46@3.375,5.8 4.1,5.8 6.2,7.9 R22.2@8.3,7.9
C18: IC1.47 R23.2 | length 4.4
  Bottom Layer w0.2: IC1.47@3.375,5.4 4.28,5.4 5.68,6.8 R23.2@7.2,6.8
C19: IC1.48 R24.2 | length 3.1
  Bottom Layer w0.2: IC1.48@3.375,5 4.375,5 5.175,5.8 R24.2@6.1,5.8
C20: IC1.49 R25.2 | length 5.3
  Bottom Layer w0.2: IC1.49@3.375,4.6 4.605,4.6 5.205,5.2 7.8,5.2 8.2,5.6 R25.2@8.3,5.6
C21: IC1.50 R26.2 | length 4
  Bottom Layer w0.2: IC1.50@3.375,4.2 4.7,4.2 5.1,4.6 R26.2@7.2,4.6
C22: IC1.51 R27.2 | length 2.8
  Bottom Layer w0.2: IC1.51@3.375,3.8 5.9,3.8 R27.2@6.1,3.6
C23: IC1.52 R28.2 | length 5.3
  Bottom Layer w0.2: IC1.52@3.375,3.4 4.6,3.4 5,3 7.8,3 8.2,3.4 R28.2@8.3,3.4
C24: IC1.53 R29.2 | length 4.1
  Bottom Layer w0.2: IC1.53@3.375,3 4.436,3 5.036,2.4 R29.2@7.2,2.4
C25: IC1.54 R30.2 | length 3.2
  Bottom Layer w0.2: IC1.54@3.375,2.6 4.341,2.6 5.517,1.424 5.976,1.424 6,1.4 R30.2@6.1,1.4
C26: IC1.55 R31.2 | length 5.7
  Bottom Layer w0.2: IC1.55@3.375,2.2 4.246,2.2 5.646,0.8 7.8,0.8 8.2,1.2 R31.2@8.3,1.2
C27: IC1.56 R32.2 | length 4.5
  Bottom Layer w0.2: IC1.56@3.375,1.8 4.151,1.8 5.751,0.2 R32.2@7.2,0.2
C28: IC1.57 R33.2 | length 3.8
  Bottom Layer w0.2: IC1.57@3.375,1.4 4.035,1.4 4.917,0.517 4.917,0.283 6,-0.8 R33.2@6.1,-0.8
C29: IC1.58 R34.2 | length 6.5
  Bottom Layer w0.2: IC1.58@3.375,1 3.94,1 4.567,0.372 4.567,-0.321 5.646,-1.4 7.8,-1.4 8.2,-1 R34.2@8.3,-1
C30: IC1.59 R35.2 | length 5.3
  Bottom Layer w0.2: IC1.59@3.375,0.6 3.845,0.6 4.217,0.228 4.217,-0.466 5.551,-1.8 7,-1.8 R35.2@7.2,-2
C31: IC1.1 R36.2 | length 4.8
  Bottom Layer w0.2: IC1.1@2.8,-0.375 2.8,-0.575 3.775,-0.575 5.8,-2.6 5.8,-3 6,-3.2 R36.2@6,-3.3
C32: IC1.2 R37.2 | length 3.9
  Bottom Layer w0.2: IC1.2@2.4,-0.375 2.4,-0.845 4.555,-3 4.6,-3 4.8,-3.2 R37.2@4.8,-3.3
C33: IC1.3 R38.2 | length 3.6
  Bottom Layer w0.2: IC1.3@2,-0.375 2,-1.002 2.95,-1.952 2.95,-2.55 3.6,-3.2 R38.2@3.6,-3.3
GND: C1.2 C2.1 C3.1 C4.1 C5.1 C6.1 C7.1 IC1.11 IC1.17 IC1.60 IC1.61 J1.1 J2.1 J3.1 R3.1 R4.1 R5.1 X5.1 X10.1 | length 64.5
  Layer 3 w0.5: v3(-8.521,-7.521) -6.007,-5.007 -3.759,-5.007 -2.776,-4.024 ; v3(-3.8,-3) -2.776,-4.024 ; v3(0.4,-5) -0.511,-4.089 -0.511,-3.508 v3(-1.31,-2.71) ; v3(1.8,9.5) 1.79,9.49 1.79,8.496 0,6.706 v3(0,5) v3(0,4) v3(0,3) v3(0,2) v3(0,1) 0,-1.1 -1.31,-2.41 v3(-1.31,-2.71) ; -2.776,-4.024 -2.624,-4.024 v3(-1.31,-2.71)
  Bottom Layer w0.2: J1.1@-8.6,-8.3 -8.5,-8.2 -8.521,-8.179 v3(-8.521,-7.521) ; J1.1@-8.5,-8.3 -8.5,-8.35 -8.4,-8.45 -7.55,-9.3 J2.1@-7.5,-9.3 R3.1@-6.4,-9.3 ; C7.1@-5,-3 C7.1@-5,-2.8 -5,-1.7 R5.1@-4.8,-1.5 ; IC1.17@-3.375,0.6 -2.425,0.6 IC1.61@-1.212,1.812 ; J3.1@-1.929,-5.4 -1.929,-4.829 -1.583,-4.483 -1.583,-3.983 C5.1@-1.4,-3.8 ; C4.1@-1.5,-2.1 -1.4,-2.1 -1.2,-1.9 IC1.11@-1.2,-0.375 -1.2,1.8 v3(-1,2) v3(0,3) v3(1,2) 2.525,0.475 2.525,0.442 2.767,0.2 IC1.60@3.375,0.2 ; R4.1@-0.2,-4.3 -0.2,-4.4 v3(0.4,-5)
  Bottom Layer w0.5: X5.1@-13.1,-1.9 X10.1@-10.5,-1.9 ; X10.1@-10.5,-1.7 X10.1@-10.5,-1.9 ; C7.1@-5,-3 v3(-3.8,-3) ; C7.1@-5,-2.8 -5.2,-3 -7,-3 -8.1,-1.9 X10.1@-10.5,-1.9 ; C5.1@-1.4,-3.8 -1.319,-3.719 -1.319,-2.719 v3(-1.31,-2.71) ; C4.1@-1.4,-2.1 -1.35,-2.15 -1.35,-2.656 -1.296,-2.71 v3@-1.294,-2.71 ; v3(0.4,-5) 1,-4.4 C1.2@1,-4.3 ; C2.1@1.25,8.8 1.35,8.8 1.79,9.24 1.79,9.49 1.81,9.51 1.81,10.31 C3.1@1.9,10.4 ; C6.1@1.9,12.4 1.925,12.375 C3.1@1.925,10.475
  other v3: -2,1 -1,1 1,1 2,1 -2,2 2,2 -2,3 -2,3 -1,3 1,3 2,3 -2,4 -1,4 1,4 2,4 -2,5 -1,5 1,5 2,5
NetD1_2: D1.2 D2.2 D3.2 D4.2 D5.2 D6.2 D7.2 D8.2 D9.2 D10.2 D11.2 D12.2 R6.1 | length 69.3
  Top Layer w0.2: D3.2@-11.55,10.25 -11.347,10.047 v2(-11.347,9.651) ; D4.2@-8.85,10.25 -8.647,10.047 v1(-8.647,9.651) ; D5.2@-6.15,10.25 -5.947,10.047 v1(-5.947,9.651) ; D6.2@-3.45,10.25 -3.247,10.047 v1(-3.247,9.651) ; D2.2@-3.45,15.65 -3.247,15.447 v2(-3.247,15.051) ; D7.2@-0.75,10.25 -0.547,10.047 v1(-0.547,9.651) ; D1.2@-0.75,15.65 -0.547,15.447 v2(-0.547,15.051) ; D8.2@1.95,10.25 2.153,10.047 v1(2.153,9.651) ; D12.2@1.95,15.65 2.153,15.447 v2(2.153,15.051) ; D9.2@4.65,10.25 4.853,10.047 v1(4.853,9.651) ; D10.2@7.35,10.25 7.553,10.047 v2(7.553,9.651) ; v2(8.588,14.875) 8.655,14.808 8.902,14.808 8.91,14.8 9.6,14.8 12.4,12 12.4,11.053 v2(12.953,10.5) ; D11.2@10.05,10.25 10.253,10.047 v2(10.253,9.651)
  Layer 1 w0.2: v2(-11.347,9.651) -11.347,10.5 -8.647,10.5 ; v1(-8.647,9.651) -8.647,10.5 ; v1(-5.947,9.651) -5.947,10.5 ; v1(-3.247,9.651) -3.247,10.5 ; v2(-3.247,15.051) -3.247,15.9 -0.547,15.9 ; v1(-0.547,9.651) -0.547,10.5 ; v2(-0.547,15.051) -0.547,15.9 ; v1(2.153,9.651) 2.153,10.5 ; v2(2.153,15.051) 2.153,15.9 ; v1(4.853,9.651) 4.853,10.5 ; v2(7.553,9.651) 7.553,10.5 ; 8.299,15.258 8.588,14.97 v2(8.588,14.875) ; 8.299,15.259 8.158,15.4 6.9,15.4 6.6,15.7 5.355,15.7 5.155,15.9 2.153,15.9 ; v2(10.253,9.651) 10.253,10.5 ; v2(12.953,10.5) 10.253,10.5 ; -8.647,10.5 -5.947,10.5 ; -5.947,10.5 -3.247,10.5 ; -3.247,10.5 -0.547,10.5 ; -0.547,10.5 2.153,10.5 ; -0.547,15.9 2.153,15.9 ; 2.153,10.5 4.853,10.5 ; 4.853,10.5 7.553,10.5 ; 7.553,10.5 10.253,10.5
  Bottom Layer w0.2: v2(-11.347,9.651) -10.798,10.2 -10,10.2 -9.6,9.8 -9.6,8.9 -9.95,8.55 -9.95,7.596 -9.754,7.4 -7.6,7.4 -7.2,7.8 R6.1@-7.1,7.8
NetD1_3: D1.3 D2.3 D3.3 D4.3 D5.3 D6.3 D7.3 D8.3 D9.3 D10.3 D11.3 D12.3 R7.1 | length 69.8
  Top Layer w0.2: v2(-12.6,10.9) -12.505,10.9 -12.355,11.05 -11.85,11.05 D3.3@-11.55,11.35 ; v2(-9.3,12.1) -9.25,12.05 -9.25,11.65 -8.95,11.35 D4.3@-8.85,11.35 ; v1(-6.6,12.1) -6.55,12.05 -6.55,11.65 -6.25,11.35 D5.3@-6.15,11.35 ; v2(-6.075,16.075) -4.525,16.075 -4.15,16.45 -3.75,16.45 D2.3@-3.45,16.75 ; v2(-3.9,12.1) -3.85,12.05 -3.85,11.65 -3.55,11.35 D6.3@-3.45,11.35 ; v1(-1.2,12.1) -1.15,12.05 -1.15,11.65 -0.85,11.35 D7.3@-0.75,11.35 ; v2(-1.126,17.425) -1.126,17.05 -0.826,16.75 D1.3@-0.75,16.75 ; v1(1.5,12.1) 1.55,12.05 1.55,11.65 1.85,11.35 D8.3@1.95,11.35 ; v2(1.574,17.425) 1.574,17.05 1.874,16.75 D12.3@1.95,16.75 ; v1(4.2,12.1) 4.25,12.05 4.25,11.65 4.55,11.35 D9.3@4.65,11.35 ; v1(6.9,12.1) 6.95,12.05 6.95,11.65 7.25,11.35 D10.3@7.35,11.35 ; v2(9.6,12.1) 9.65,12.05 9.65,11.65 9.95,11.35 D11.3@10.05,11.35
  Layer 1 w0.2: v2(-12.6,10.9) -11.6,11.9 -11.6,12.5 -11.35,12.75 -9.95,12.75 -8.85,11.65 -8.4,11.65 -8.1,11.95 -8.1,12.4 -7.75,12.75 -7.25,12.75 -6.15,11.65 -5.7,11.65 -5.4,11.95 -5.4,12.4 -5.05,12.75 -4.55,12.75 -3.45,11.65 -3,11.65 -2.7,11.95 -2.7,12.4 -2.35,12.75 -1.85,12.75 -0.75,11.65 -0.3,11.65 0,11.95 0,12.4 0.35,12.75 0.85,12.75 1.95,11.65 2.4,11.65 2.7,11.95 2.7,12.4 3.05,12.75 3.55,12.75 4.65,11.65 5.1,11.65 5.4,11.95 5.4,12.4 5.75,12.75 6.25,12.75 7.35,11.65 7.8,11.65 8.1,11.95 8.1,12.4 8.45,12.75 8.95,12.75 v2(9.6,12.1)
  Layer 3 w0.2: v2(-6.075,16.075) -2.476,16.075 v2(-1.126,17.425) v2(1.574,17.425) 3.775,17.425 5.155,16.045 8.355,16.045 9.2,15.2 9.2,12.5 v2(9.6,12.1)
  Bottom Layer w0.2: R7.1@-9.3,8 -9.25,8.05 -9.25,12.05 v2(-9.3,12.1)
NetD1_4: D1.4 D2.4 D3.4 D4.4 D5.4 D6.4 D7.4 D8.4 D9.4 D10.4 D11.4 D12.4 R8.1 | length 60.6
  Top Layer w0.2: v2(-10.25,12.1) -10.25,11.55 D3.4@-10.05,11.35 ; v2(-7.55,12.1) -7.55,11.55 D4.4@-7.35,11.35 ; v2(-4.85,12.1) -4.85,11.55 D5.4@-4.65,11.35 ; v2(-2.15,12.1) -2.15,11.55 D6.4@-1.95,11.35 ; v2(-2.15,17.425) -2.15,16.95 D2.4@-1.95,16.75 ; v1(0.55,12.1) 0.55,11.55 D7.4@0.75,11.35 ; v1(0.55,17.425) 0.55,16.95 D1.4@0.75,16.75 ; v2(3.25,12.1) 3.25,11.55 D8.4@3.45,11.35 ; v1(3.25,17.425) 3.25,16.95 D12.4@3.45,16.75 ; v1(5.95,12.1) 5.95,11.55 D9.4@6.15,11.35 ; v2(8.65,12.1) 8.65,11.55 D10.4@8.85,11.35 ; v2(10.479,13.179) 11.295,12.362 11.295,12.137 v2(11.362,12.07) 11.3,12.008 11.3,11.6 D11.4@11.55,11.35
  Layer 1 w0.2: v2(-10.25,12.1) -10.25,11.251 -7.55,11.251 ; v2(-7.55,12.1) -7.55,11.251 ; v2(-4.85,12.1) -4.85,11.251 ; v2(-2.15,12.1) -2.15,11.251 ; v2(-2.15,17.425) -2.15,16.651 0.55,16.651 ; v1(0.55,12.1) 0.55,11.251 ; v1(0.55,17.425) 0.55,16.651 ; v2(3.25,12.1) 3.25,11.251 ; v1(3.25,17.425) 3.25,16.651 ; v1(5.95,12.1) 5.95,11.251 ; v2(8.65,12.1) 8.65,11.251 ; v2(10.479,13.179) 10.479,13.926 8.605,15.8 7.2,15.8 6.95,16.05 5.5,16.05 4.899,16.651 3.25,16.651 ; v2(11.362,12.07) 11.362,11.381 11.233,11.251 8.65,11.251 ; -7.55,11.251 -4.85,11.251 ; -4.85,11.251 -2.15,11.251 ; -2.15,11.251 0.55,11.251 ; 0.55,11.251 3.25,11.251 ; 0.55,16.651 3.25,16.651 ; 3.25,11.251 5.95,11.251 ; 5.95,11.251 8.65,11.251
  Bottom Layer w0.2: R8.1@-8.2,9 -8.05,9.15 -8.05,11.6 v2(-7.55,12.1)
NetD13_2: D13.2 D14.2 D15.2 D16.2 D17.2 D18.2 D19.2 D20.2 D21.2 D22.2 D23.2 D24.2 R9.1 | length 58.6
  Top Layer w0.2: D14.2@-14.25,7.55 -14.047,7.347 v2(-14.047,6.951) ; D15.2@-11.55,7.55 -11.347,7.347 v2(-11.347,6.951) ; D16.2@-8.85,7.55 -8.647,7.347 v1(-8.647,6.951) ; D17.2@-6.15,7.55 -5.947,7.347 v1(-5.947,6.951) ; D18.2@-3.45,7.55 -3.247,7.347 v1(-3.247,7.21) ; D19.2@-0.75,7.55 -0.547,7.347 v1(-0.547,6.951) ; D20.2@1.95,7.55 2.153,7.347 v1(2.153,6.951) ; D21.2@4.65,7.55 4.853,7.347 v1(4.853,6.951) ; D22.2@7.35,7.55 7.553,7.347 v1(7.553,6.951) ; D23.2@10.05,7.55 10.253,7.347 v2(10.253,6.951) ; D24.2@12.75,7.55 12.953,7.347 v2(12.953,6.951) ; D13.2@15.45,-0.55 15.653,-0.753 v2(15.653,-1.149)
  Layer 1 w0.2: v2@-14.047,6.959 -14.047,7.8 -11.347,7.8 ; v2(-11.347,6.951) -11.347,7.8 ; v1(-8.647,6.951) -8.647,7.8 ; v1(-5.947,6.951) -5.947,7.8 ; v1(-3.247,7.21) -3.247,7.8 ; v1(-0.547,6.951) -0.547,7.8 ; v1(2.153,6.951) 2.153,7.8 ; v1(4.853,6.951) 4.853,7.8 ; v1(7.553,6.951) 7.553,7.8 ; v2(10.253,6.951) 10.253,7.8 ; v2(12.953,6.951) 12.953,7.8 10.253,7.8 ; -11.347,7.8 -8.647,7.8 ; -8.647,7.8 -5.947,7.8 ; -5.947,7.8 -3.247,7.8 ; -3.247,7.8 -0.547,7.8 ; -0.547,7.8 2.153,7.8 ; 2.153,7.8 4.853,7.8 ; 4.853,7.8 7.553,7.8 ; 7.553,7.8 10.253,7.8
  Layer 3 w0.2: v2(12.953,6.951) 12.958,6.947 12.958,6.542 13.5,6 13.5,1.005 14.4,0.105 v2(15.653,-1.149)
  Bottom Layer w0.2: v2(-11.347,6.951) -11.28,6.884 -11.28,6.458 -10.071,5.25 -7.517,5.25 -7.4,5.367 -7.4,5.4 -7.2,5.6 R9.1@-7.1,5.6
NetD13_3: D13.3 D14.3 D15.3 D16.3 D17.3 D18.3 D19.3 D20.3 D21.3 D22.3 D23.3 D24.3 R10.1 | length 69.4
  Top Layer w0.2: D14.3@-14.25,8.65 -14.25,9.355 -14.1,9.505 v2(-14.1,9.6) ; v2(-12,9.4) -11.95,9.35 -11.95,8.95 -11.65,8.65 D15.3@-11.55,8.65 ; v1(-9.3,9.4) -9.25,9.35 -9.25,8.95 -8.95,8.65 D16.3@-8.85,8.65 ; v1(-6.6,9.4) -6.55,9.35 -6.55,8.95 -6.25,8.65 D17.3@-6.15,8.65 ; v2(-3.9,9.4) -3.85,9.35 -3.85,8.95 -3.55,8.65 D18.3@-3.45,8.65 ; v1(-1.2,9.4) -1.15,9.35 -1.15,8.95 -0.85,8.65 D19.3@-0.75,8.65 ; v1(1.5,9.4) 1.55,9.35 1.55,8.95 1.85,8.65 D20.3@1.95,8.65 ; v1(4.2,9.4) 4.25,9.35 4.25,8.95 4.55,8.65 D21.3@4.65,8.65 ; v2(6.9,9.4) 6.95,9.35 6.95,8.95 7.25,8.65 D22.3@7.35,8.65 ; v2(9.6,9.4) 9.65,9.35 9.65,8.95 9.95,8.65 D23.3@10.05,8.65 ; v2(12.3,9.4) 12.35,9.35 12.35,8.95 12.65,8.65 D24.3@12.75,8.65 ; D13.3@15.45,0.55 15.654,0.754 v2(15.654,1.305)
  Layer 1 w0.2: v2(-14.1,9.6) -13.65,10.05 -12.65,10.05 -11.55,8.95 -11.1,8.95 -10.8,9.25 -10.8,9.7 -10.45,10.05 -9.95,10.05 -8.85,8.95 -8.4,8.95 -8.1,9.25 -8.1,9.7 -7.75,10.05 -7.25,10.05 -6.15,8.95 -5.7,8.95 -5.4,9.25 -5.4,9.7 -5.05,10.05 -4.55,10.05 -3.45,8.95 -3,8.95 -2.7,9.25 -2.7,9.7 -2.35,10.05 -1.85,10.05 -0.75,8.95 -0.3,8.95 0,9.25 0,9.7 0.35,10.05 0.85,10.05 1.95,8.95 2.4,8.95 2.7,9.25 2.7,9.7 3.05,10.05 3.55,10.05 4.65,8.95 5.1,8.95 5.4,9.25 5.4,9.7 5.75,10.05 6.25,10.05 v2(6.9,9.4) 7.35,8.95 7.8,8.95 8.1,9.25 8.1,9.7 8.45,10.05 8.95,10.05 10.05,8.95 10.5,8.95 10.8,9.25 10.8,9.7 11.15,10.05 11.65,10.05 v2(12.3,9.4) 13.154,9.4 13.704,9.95 14.483,9.95 14.9,9.533 14.9,8.477 15.4,7.977 15.4,6.7 16.8,5.3 16.8,2.3 17.4,1.7 17.4,0.9 17,0.5 16.452,0.5 15.654,1.298 v2(15.654,1.305)
  Bottom Layer w0.2: v2(-12,9.4) -10.8,8.2 -10.8,6.474 -10.126,5.8 R10.1@-9.3,5.8
NetD13_4: D13.4 D14.4 D15.4 D16.4 D17.4 D18.4 D19.4 D20.4 D21.4 D22.4 D23.4 D24.4 R11.1 | length 59
  Top Layer w0.2: v2(-12.95,9.4) -12.95,8.85 D14.4@-12.75,8.65 ; v2(-10.25,9.4) -10.25,8.85 D15.4@-10.05,8.65 ; v1(-7.55,9.4) -7.55,8.85 D16.4@-7.35,8.65 ; v2(-4.85,9.4) -4.85,8.85 D17.4@-4.65,8.65 ; v1(-2.15,9.4) -2.15,8.85 D18.4@-1.95,8.65 ; v1(0.55,9.4) 0.55,8.85 D19.4@0.75,8.65 ; v1(3.25,9.4) 3.25,8.85 D20.4@3.45,8.65 ; v2(5.95,9.4) 5.95,8.85 D21.4@6.15,8.65 ; v2(8.65,9.4) 8.65,8.85 D22.4@8.85,8.65 ; v2(11.35,9.4) 11.35,8.85 D23.4@11.55,8.65 ; v2(14.05,9.4) 14.05,8.85 D24.4@14.25,8.65 ; v2(16.75,1.3) 16.75,0.75 D13.4@16.95,0.55
  Layer 1 w0.2: v2(-12.95,9.4) -12.95,8.551 -10.25,8.551 ; v2(-10.25,9.4) -10.25,8.551 ; v1(-7.55,9.4) -7.55,8.551 ; v2(-4.85,9.4) -4.85,8.551 ; v1(-2.15,9.4) -2.15,8.551 ; v1(0.55,9.4) 0.55,8.551 ; v1(3.25,9.4) 3.25,8.551 ; v2(5.95,9.4) 5.95,8.551 ; v2(8.65,9.4) 8.65,8.551 ; v2(11.35,9.4) 11.35,8.551 ; v2(14.05,9.4) 14.05,8.551 ; v2(16.75,1.3) 16.4,1.65 16.4,5.1 15,6.5 15,7.601 14.05,8.551 ; -10.25,8.551 -7.55,8.551 ; -7.55,8.551 -4.85,8.551 ; -4.85,8.551 -2.15,8.551 ; -2.15,8.551 0.55,8.551 ; 0.55,8.551 3.25,8.551 ; 3.25,8.551 5.95,8.551 ; 5.95,8.551 8.65,8.551 ; 8.65,8.551 11.35,8.551 ; 11.35,8.551 14.05,8.551
  Bottom Layer w0.2: v2(-10.25,9.4) -10.3,9.35 -10.3,8.155 -10.3,7.451 -9.949,7.1 -9.941,7.1 -9.641,6.8 R11.1@-8.2,6.8
NetD25_2: D25.2 D26.2 D27.2 D28.2 D29.2 D30.2 D31.2 D32.2 D33.2 D34.2 D35.2 D36.2 R12.1 | length 55
  Top Layer w0.2: D26.2@-14.25,4.85 -14.047,4.647 v2(-14.047,4.251) ; D27.2@-11.55,4.85 -11.347,4.647 v2(-11.347,4.251) ; D28.2@-8.85,4.85 -8.647,4.647 v1(-8.647,4.251) ; D29.2@-6.15,4.85 -5.947,4.647 v1(-5.947,4.251) ; D30.2@-3.45,4.85 -3.247,4.647 v1(-3.247,4.251) ; D31.2@-0.75,4.85 -0.547,4.647 v1(-0.547,4.251) ; D32.2@1.95,4.85 2.153,4.647 v1(2.153,4.251) ; D33.2@4.65,4.85 4.853,4.647 v1(4.853,4.251) ; D34.2@7.35,4.85 7.553,4.647 v1(7.553,4.251) ; D35.2@10.05,4.85 10.253,4.647 v1(10.253,4.251) ; D36.2@12.75,4.85 12.953,4.647 v2(12.953,4.251) ; v2(14.958,1.379) 14.958,1.474 15.05,1.566 15.05,1.85 15.35,2.15 D25.2@15.45,2.15
  Layer 1 w0.2: v2@-14.047,4.259 -14.047,5.1 -11.347,5.1 ; v2(-11.347,4.251) -11.347,5.1 ; v1(-8.647,4.251) -8.647,5.1 ; v1(-5.947,4.251) -5.947,5.1 ; v1(-3.247,4.251) -3.247,5.1 ; v1(-0.547,4.251) -0.547,5.1 ; v1(2.153,4.251) 2.153,5.1 ; v1(4.853,4.251) 4.853,5.1 ; v1(7.553,4.251) 7.553,5.1 ; v1(10.253,4.251) 10.253,5.1 ; v2(12.953,4.251) 12.953,5.1 ; v2(14.958,1.379) 14.95,1.387 14.95,1.972 14.65,2.272 14.65,4.5 14.05,5.1 12.953,5.1 ; -11.347,5.1 -8.647,5.1 ; -8.647,5.1 -5.947,5.1 ; -5.947,5.1 -3.247,5.1 ; -3.247,5.1 -0.547,5.1 ; -0.547,5.1 2.153,5.1 ; 2.153,5.1 4.853,5.1 ; 4.853,5.1 7.553,5.1 ; 7.553,5.1 10.253,5.1 ; 10.253,5.1 12.953,5.1
  Bottom Layer w0.2: v2(-11.347,4.251) -11.261,4.251 -10.06,3.05 -7.517,3.05 -7.4,3.167 -7.4,3.2 -7.2,3.4 R12.1@-7.1,3.4